# Altium PCB PCB1.pcbdoc (part 1 of 3)
Units mil, origin at the board's own origin, x right, y up, seen from the top; angles counter-clockwise.
Board outline 3937.01 x 3937.01 mil, 6 copper layers (Top Layer, Inner1, Inner2, Inner3, Inner4, Bottom Layer), stack 60.565 mil thick; 226 components, 112 nets, 767 pads, 893 vias.
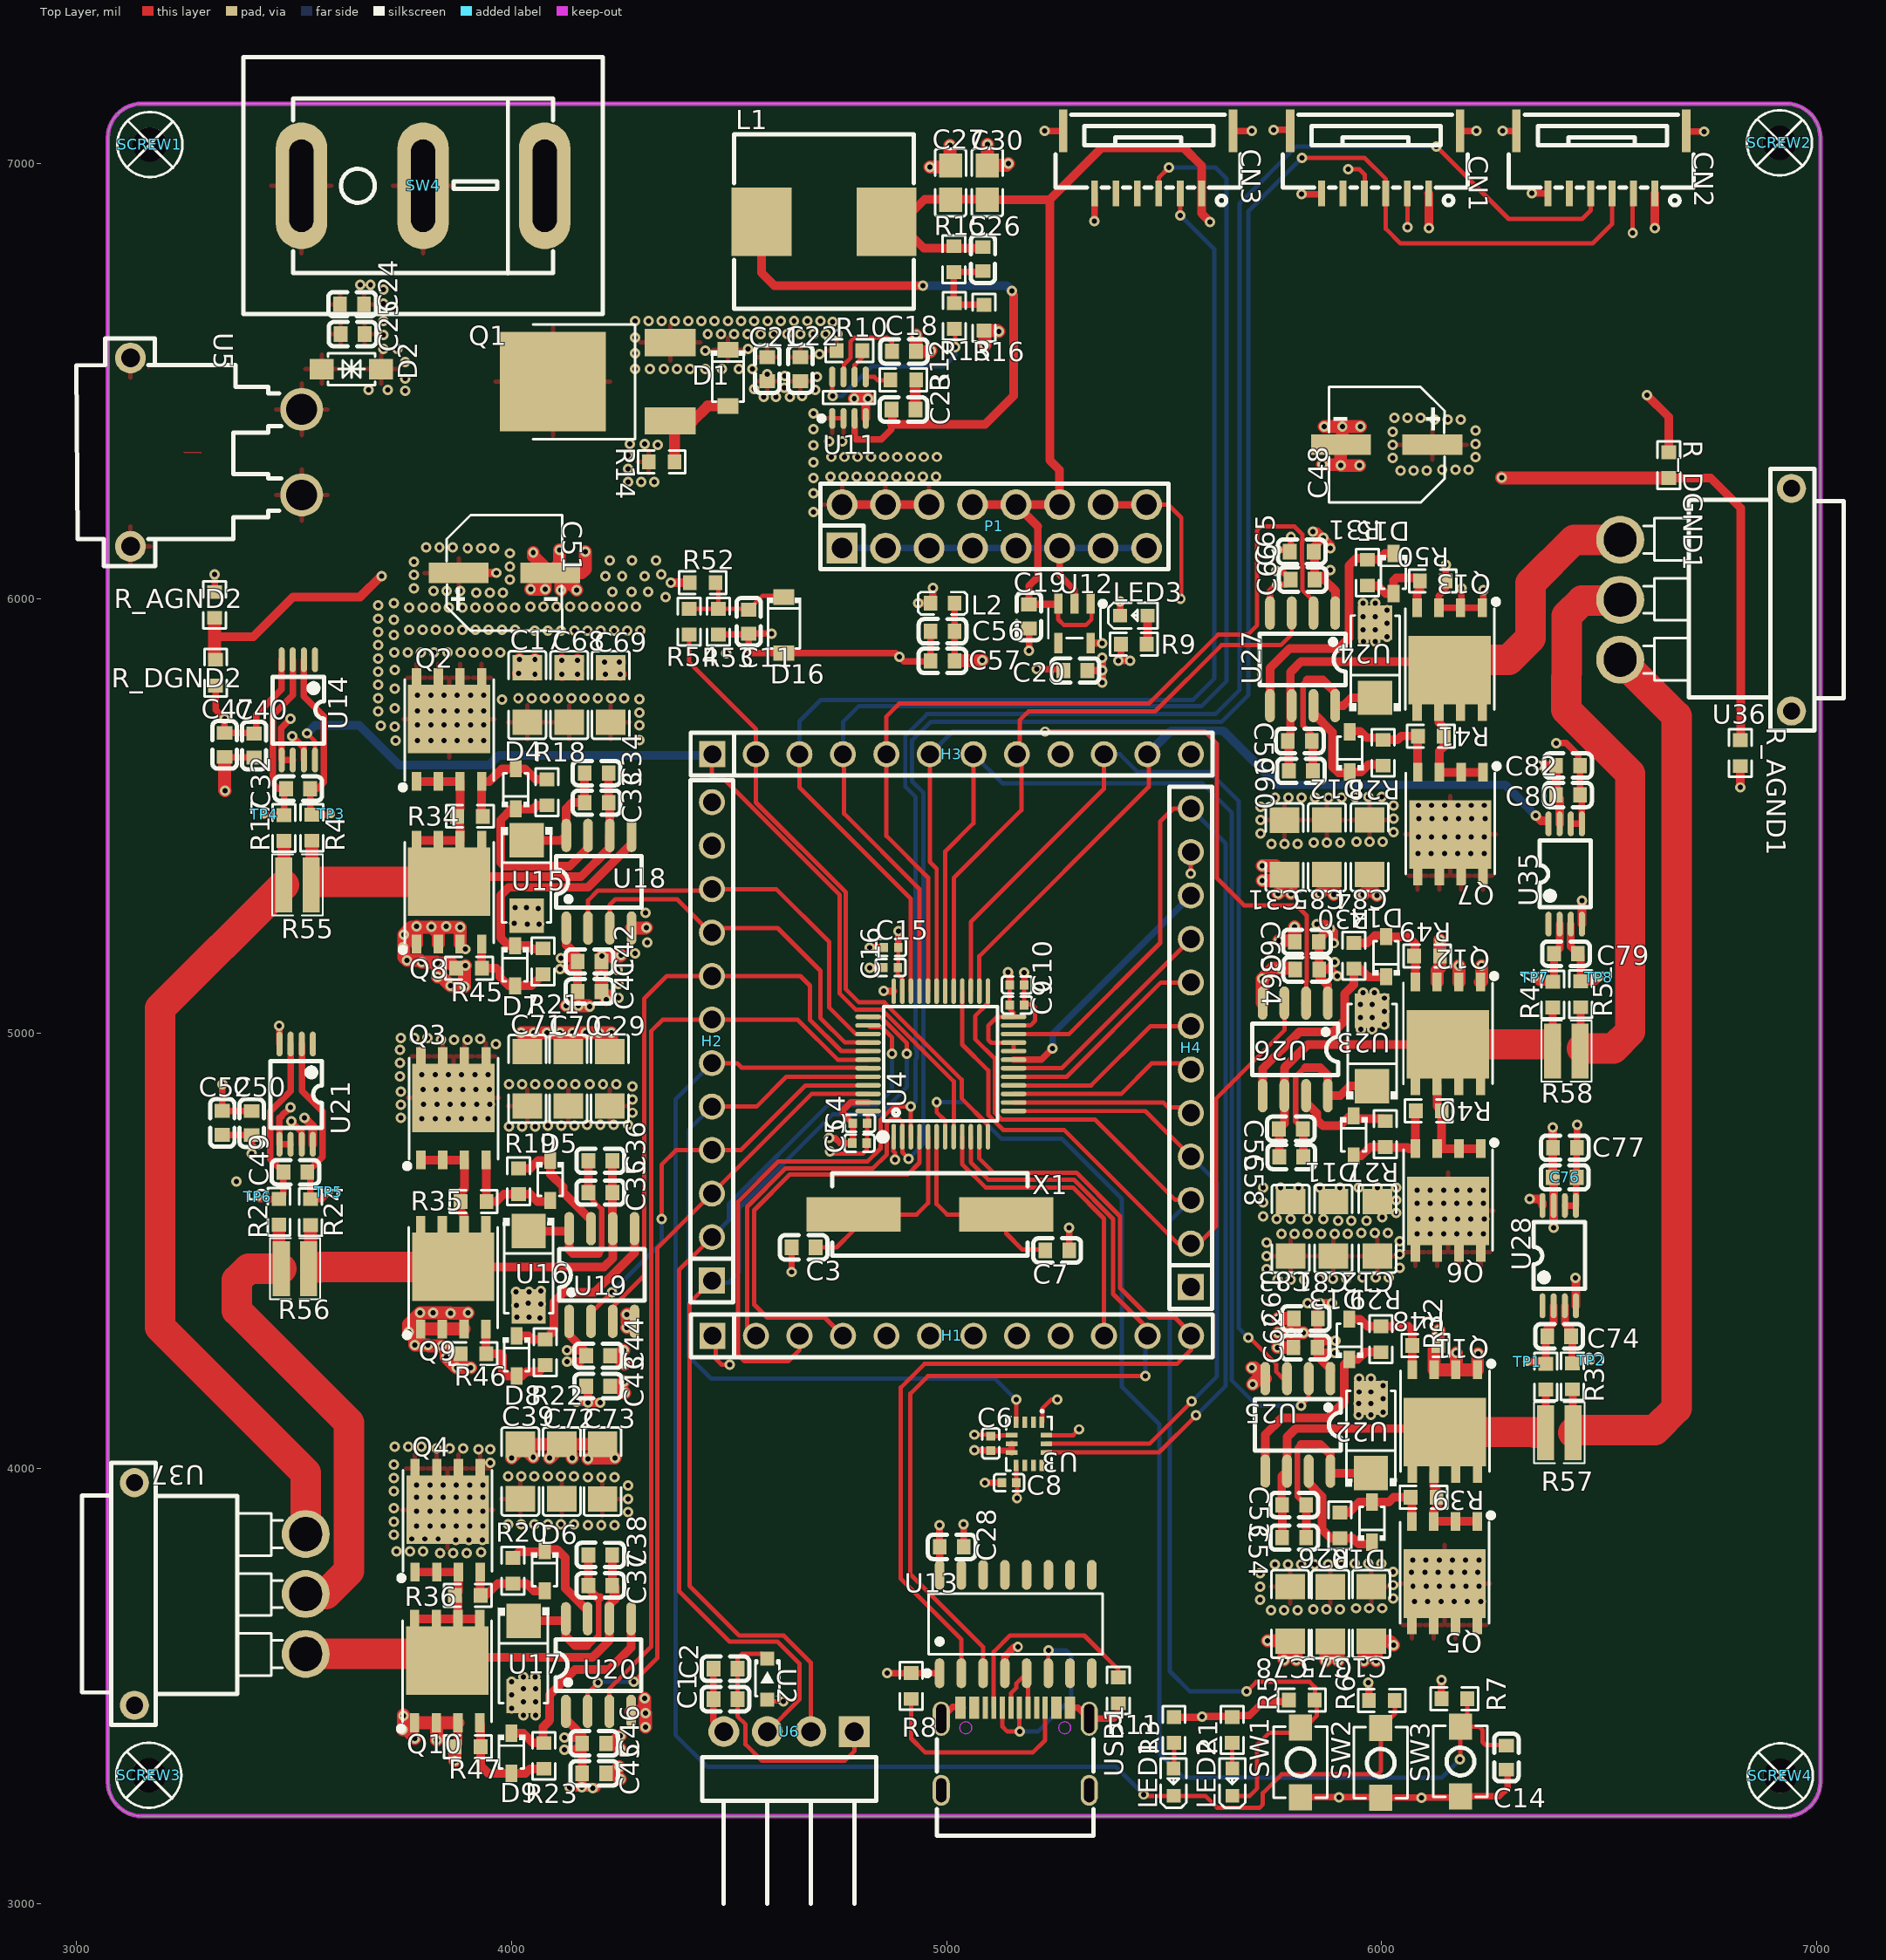
[diagram p0: Top Layer view]
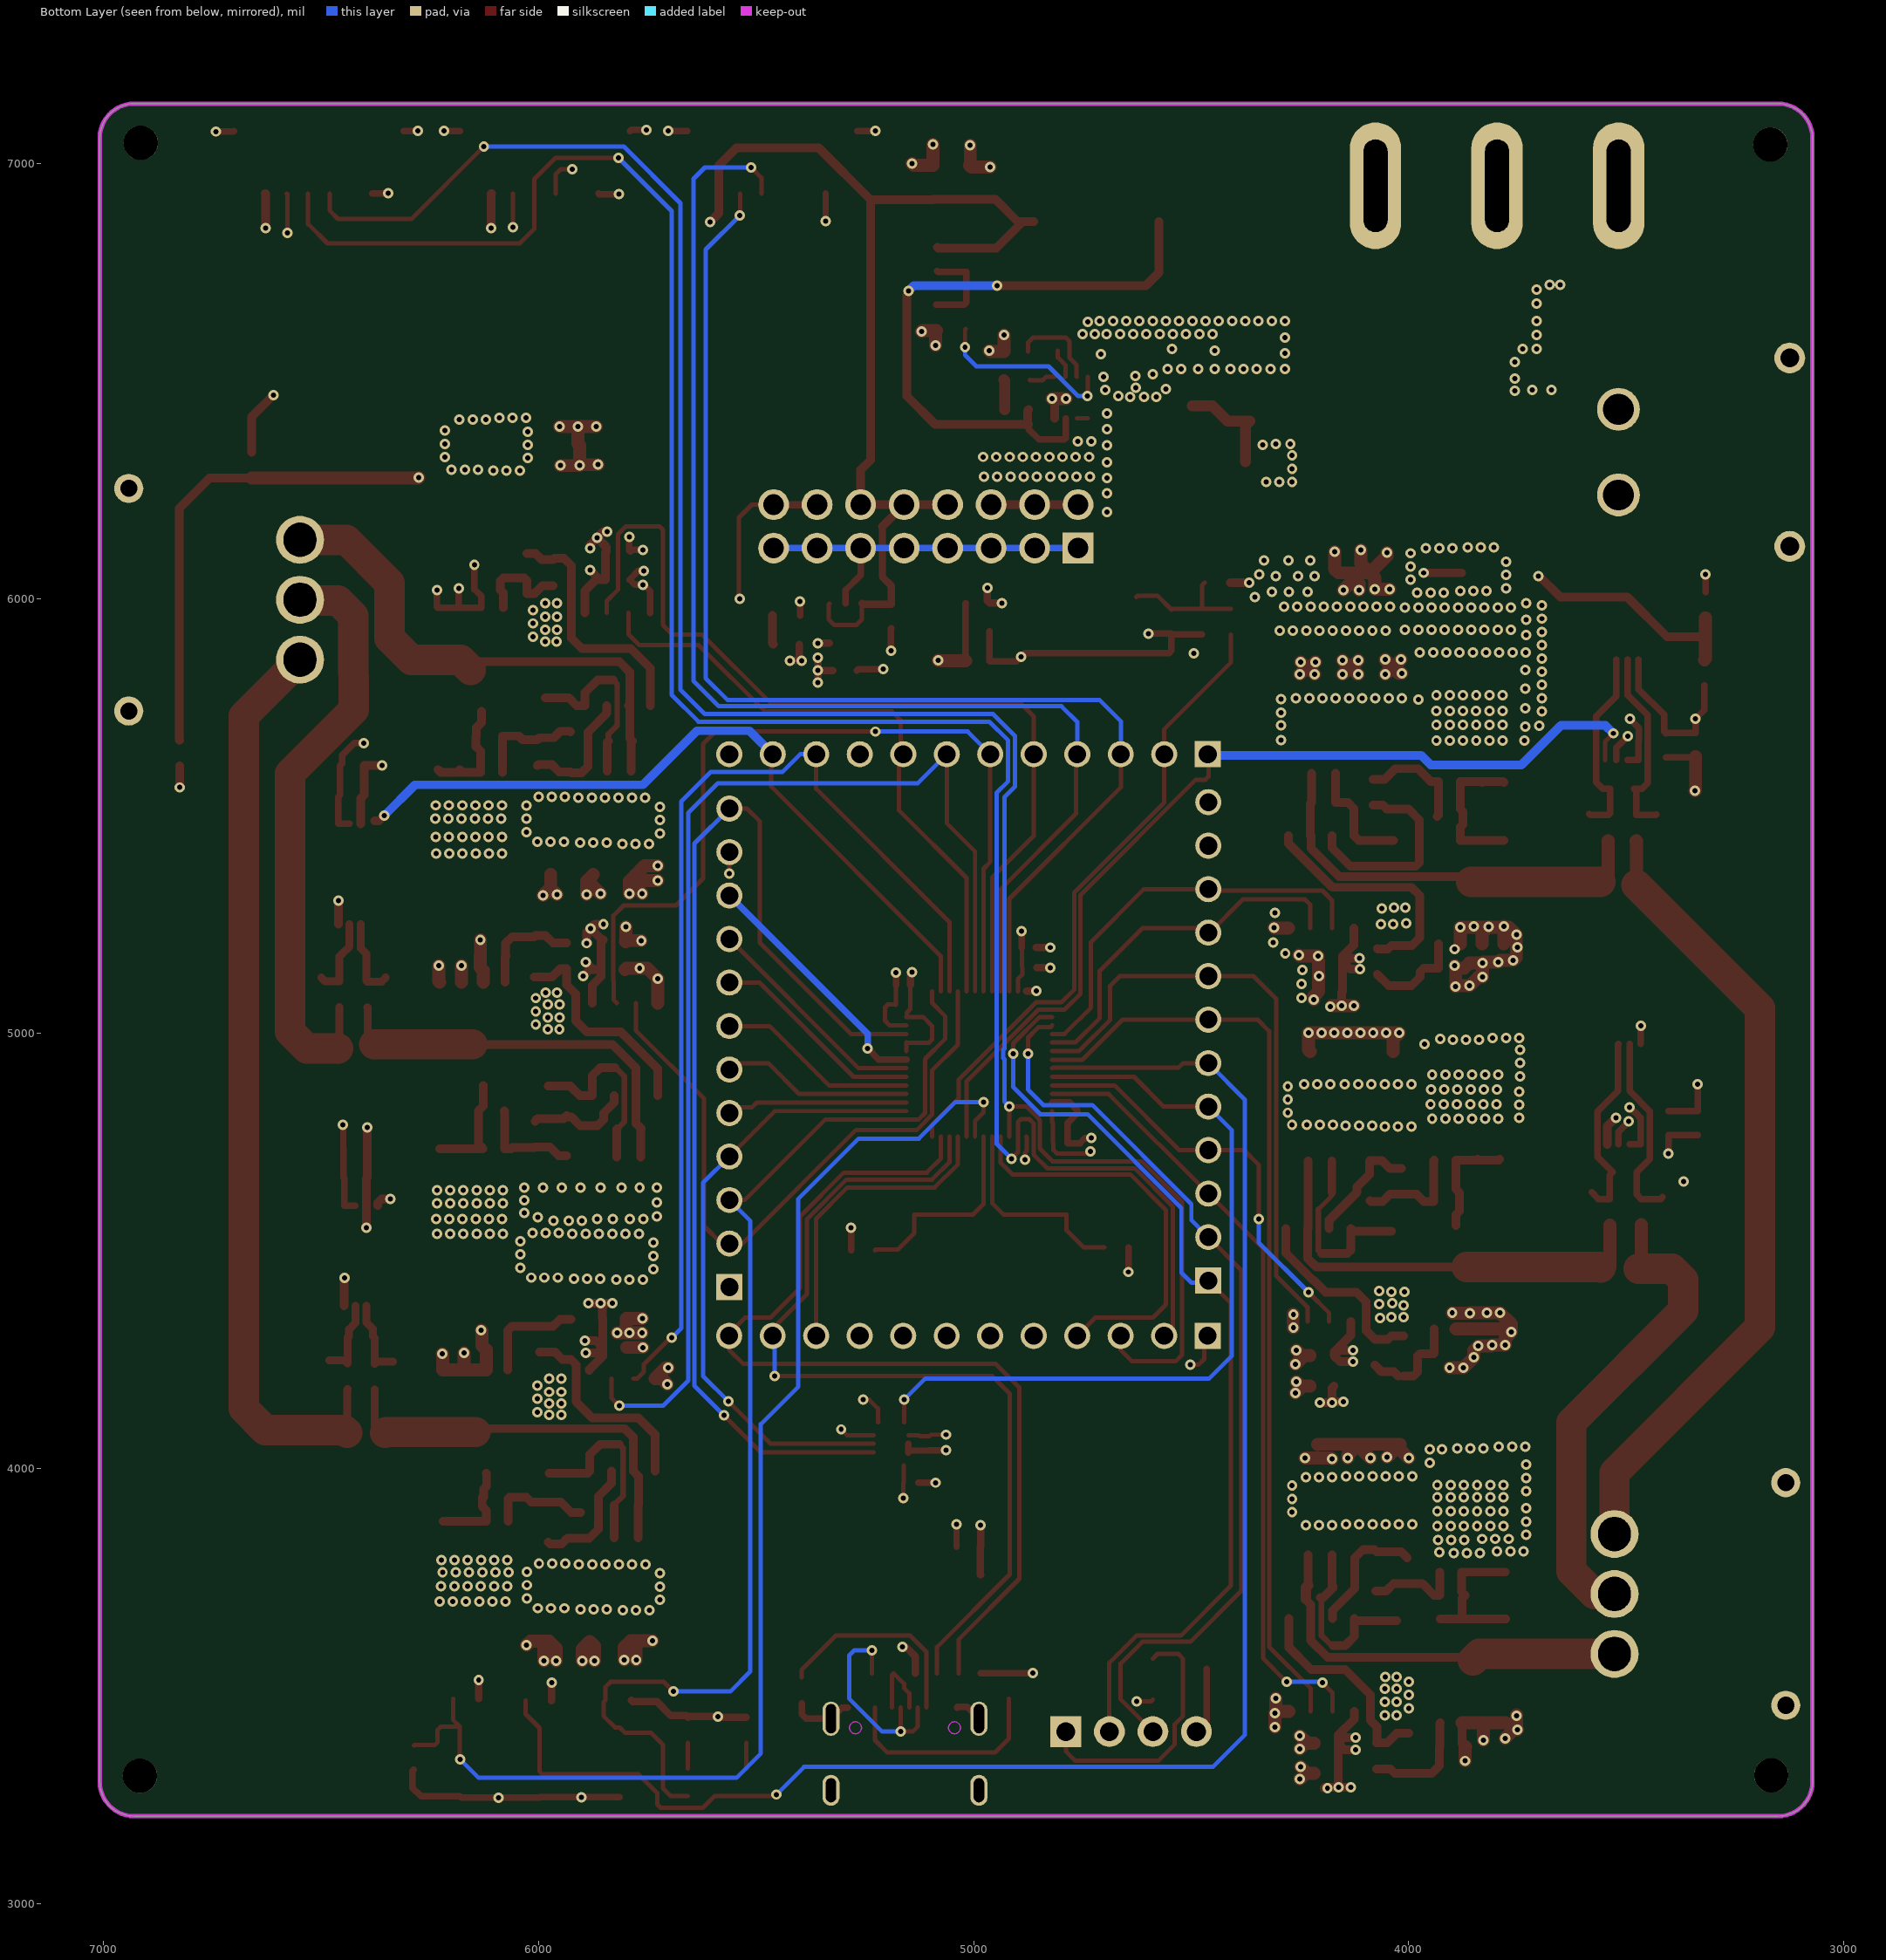
[diagram p1: Bottom Layer view, seen from below]
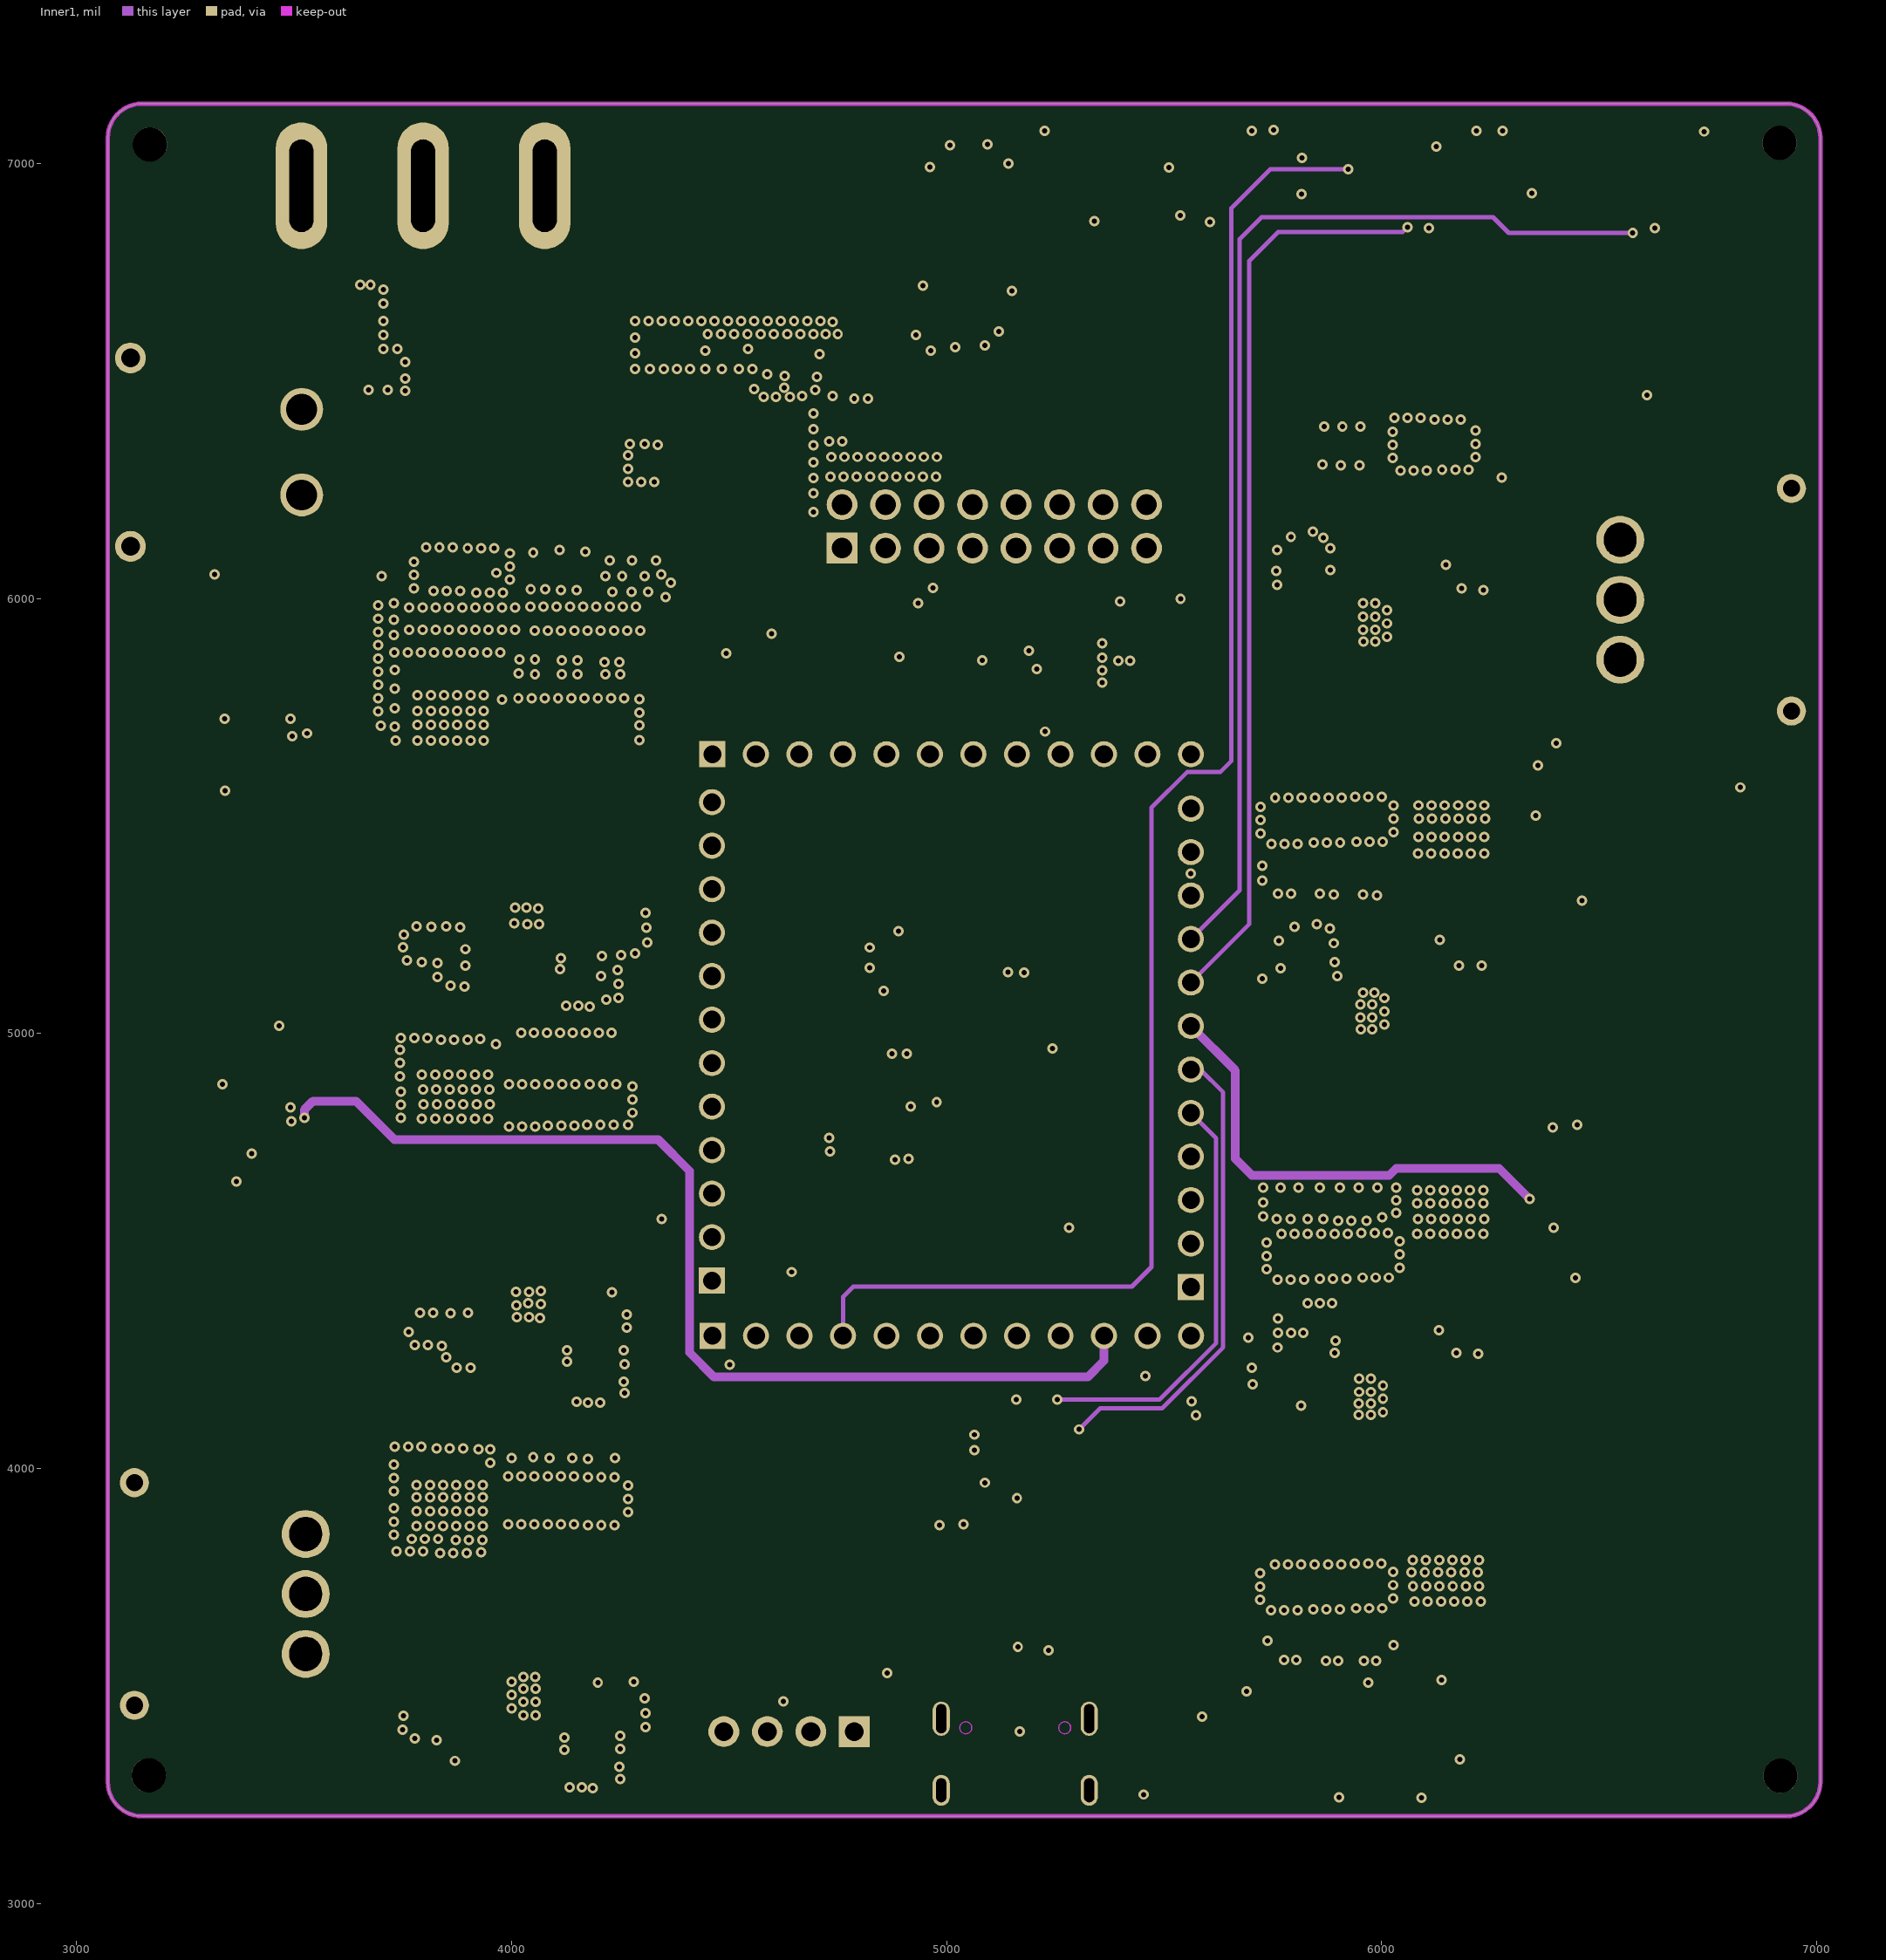
[diagram p2: Inner1]
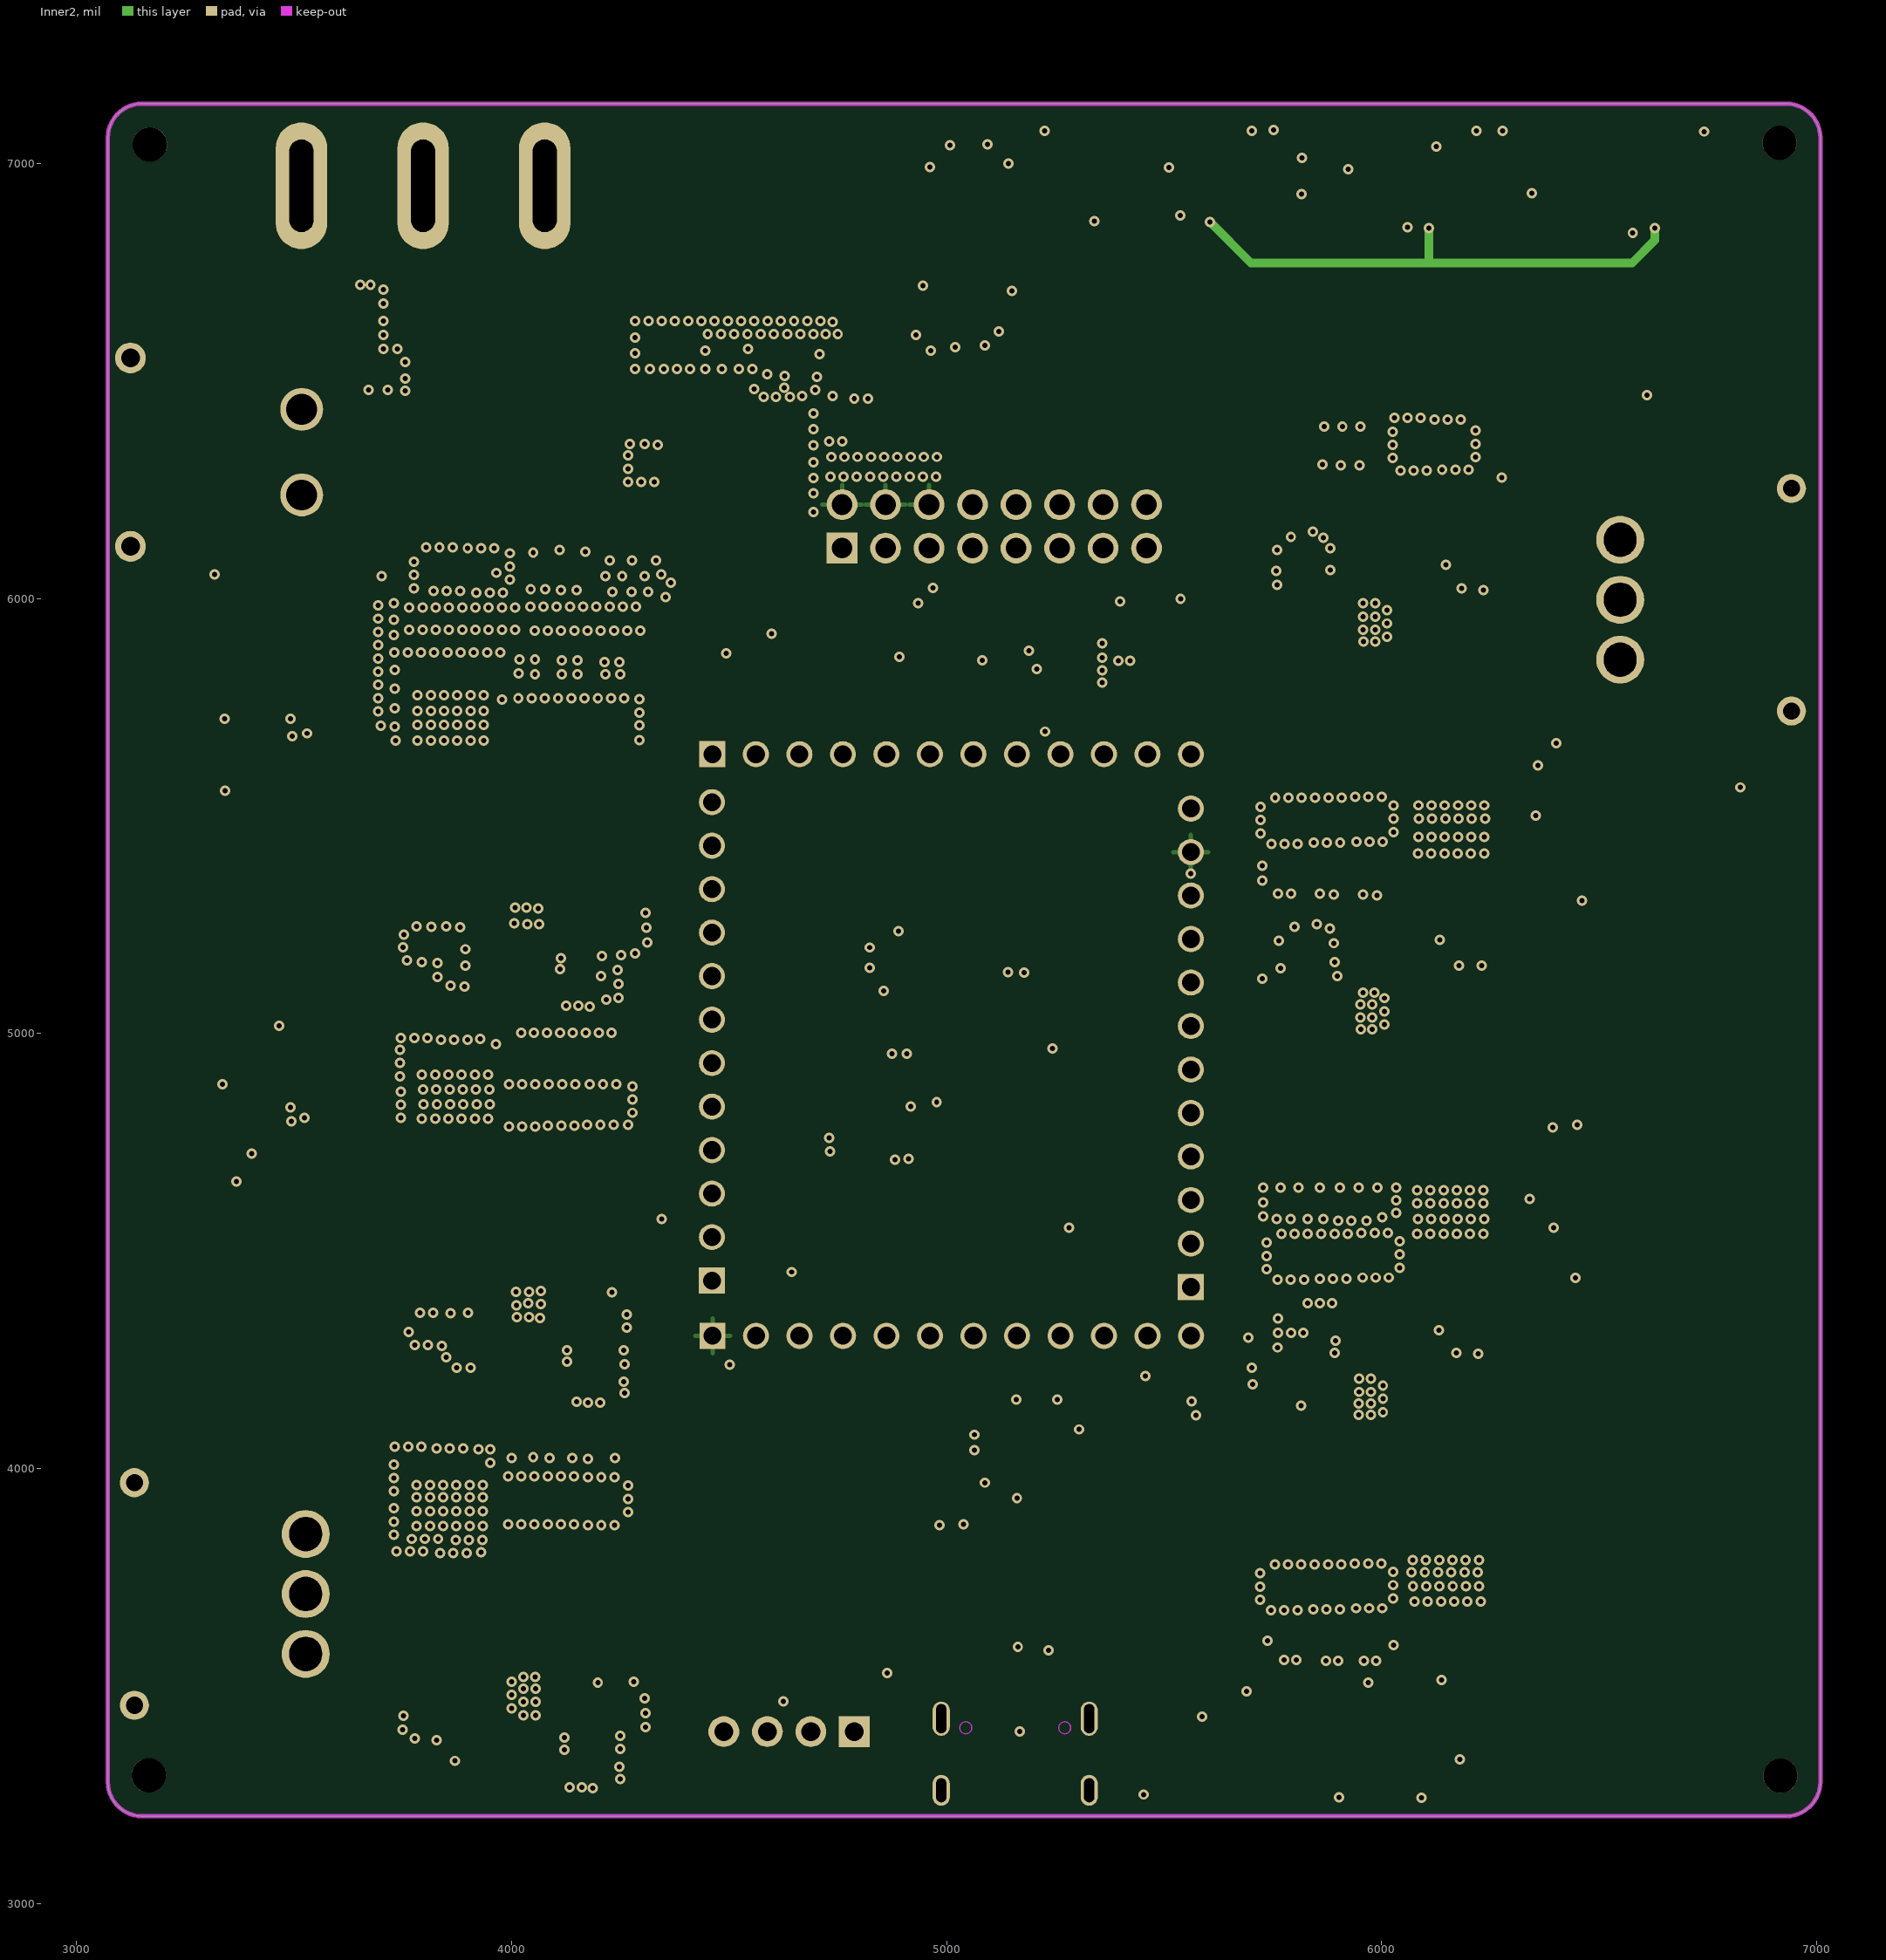
[diagram p3: Inner2]
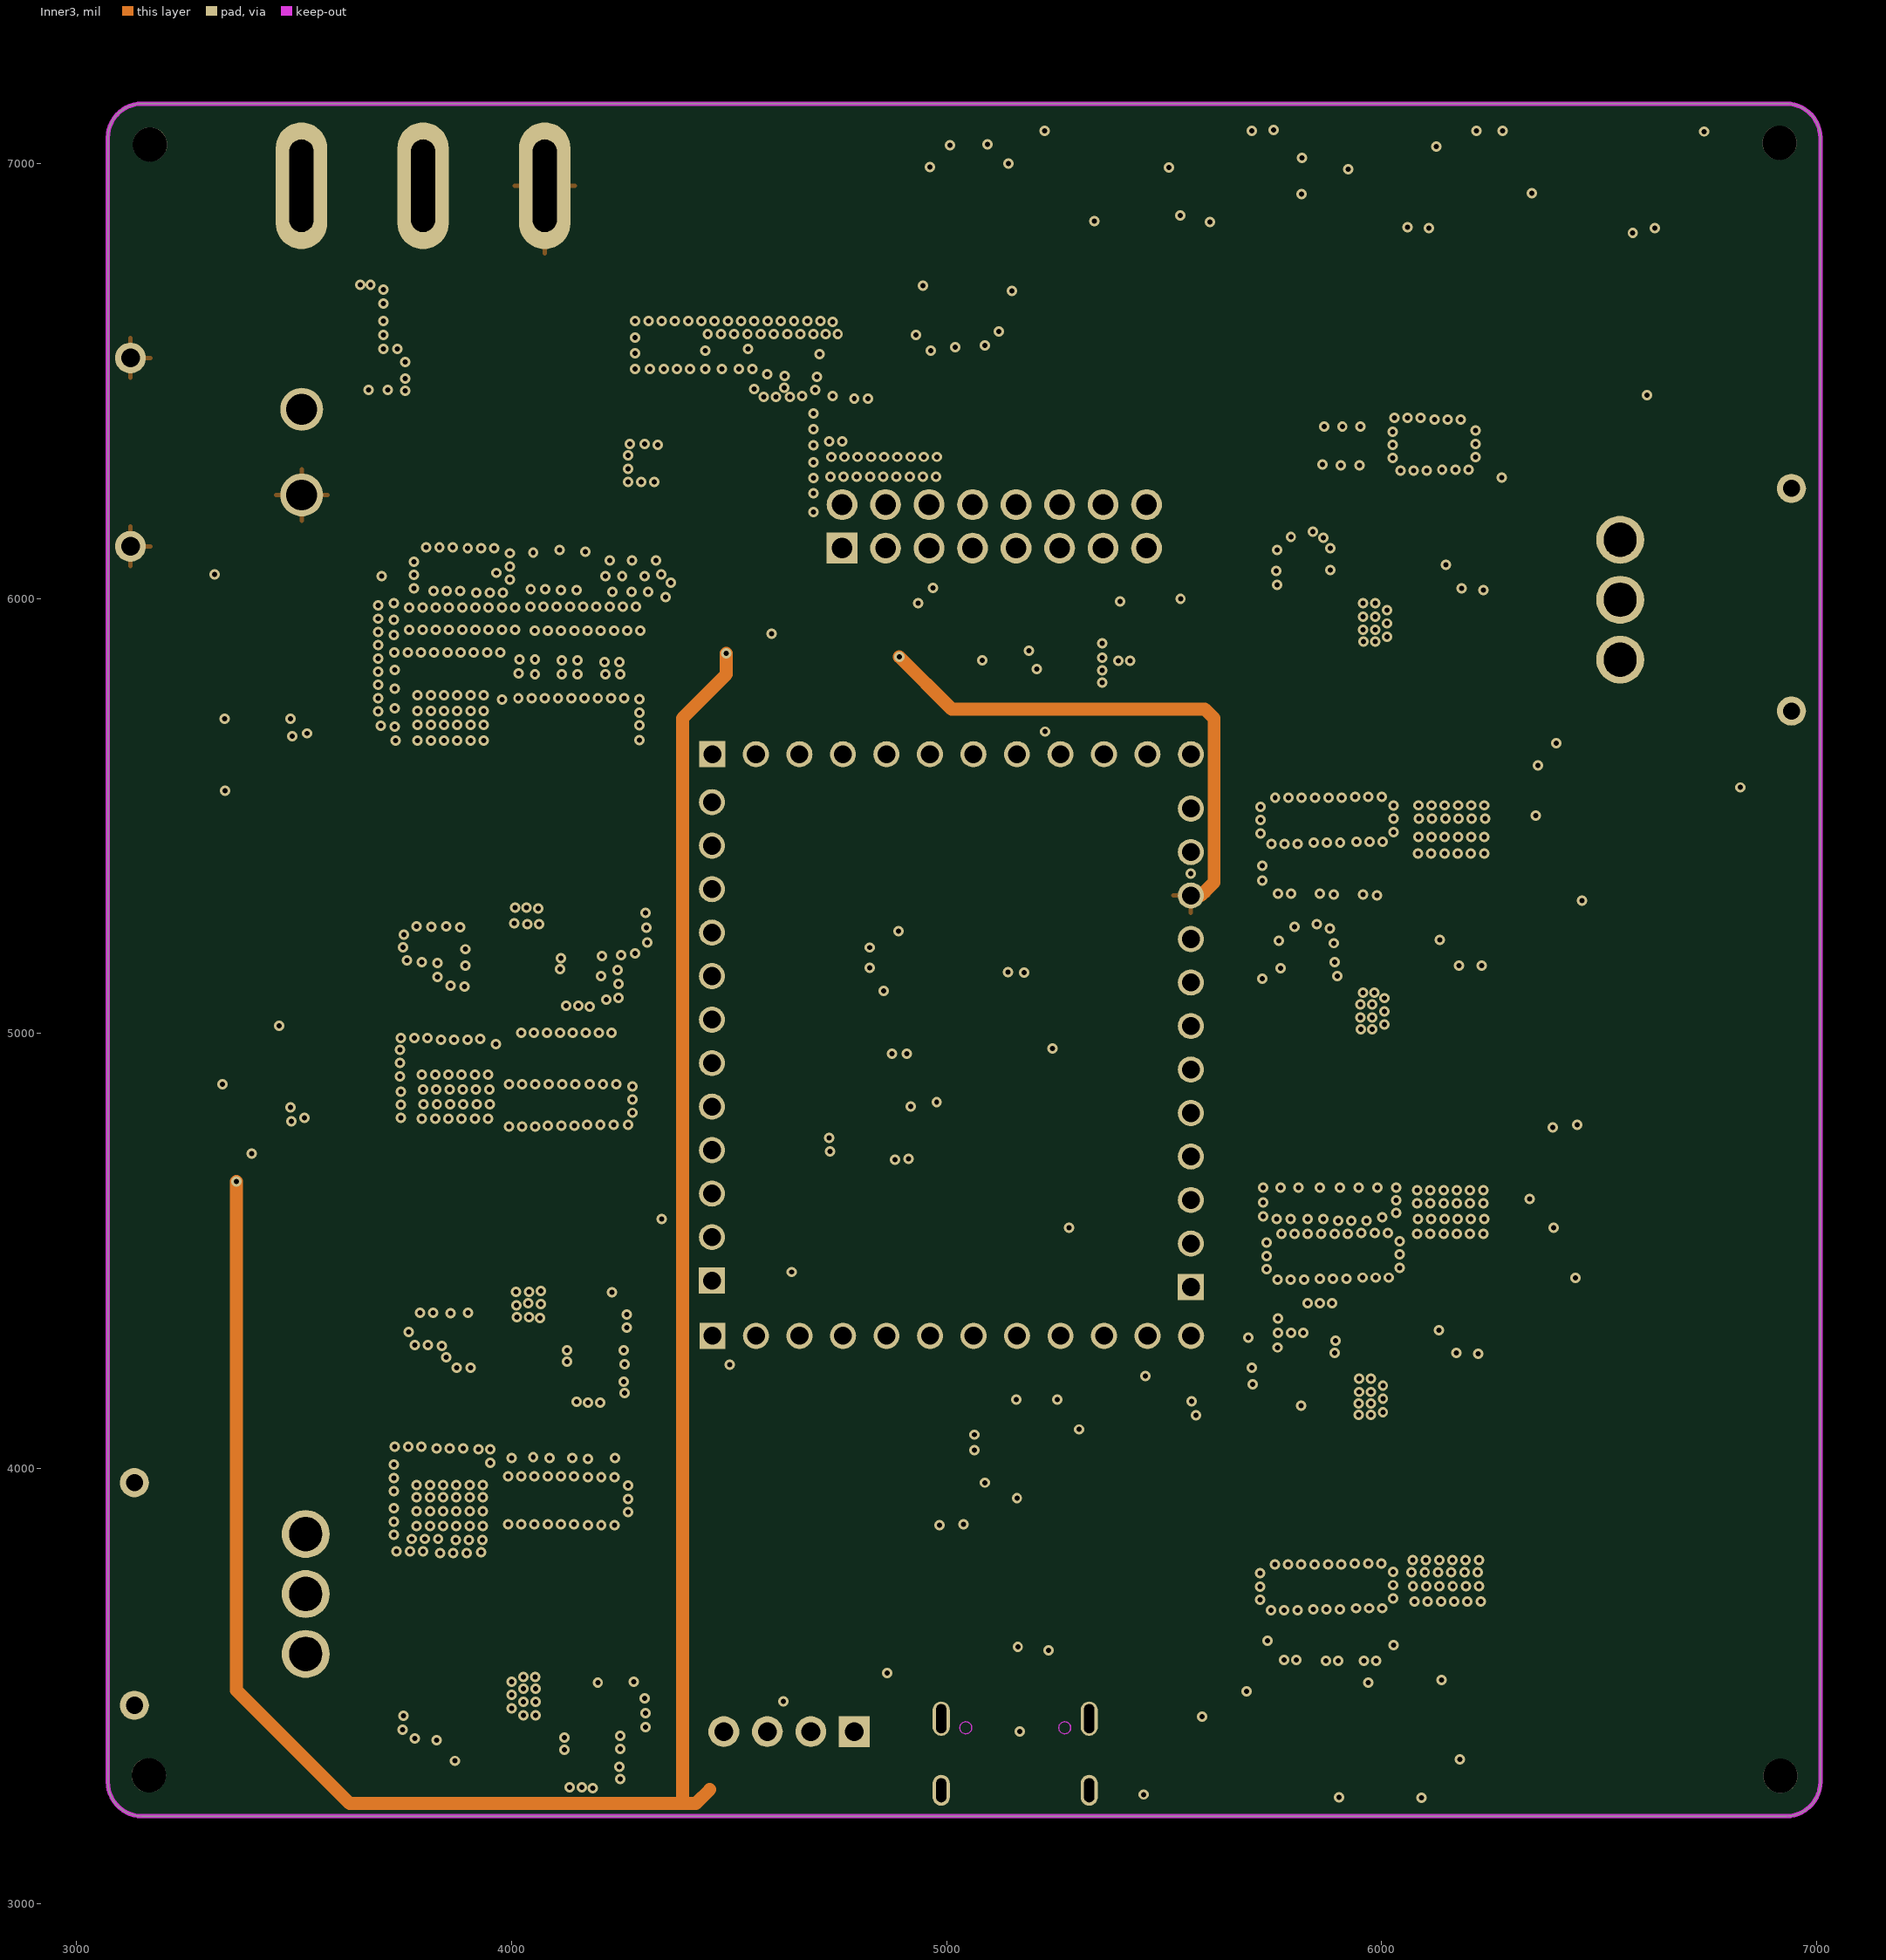
[diagram p4: Inner3]
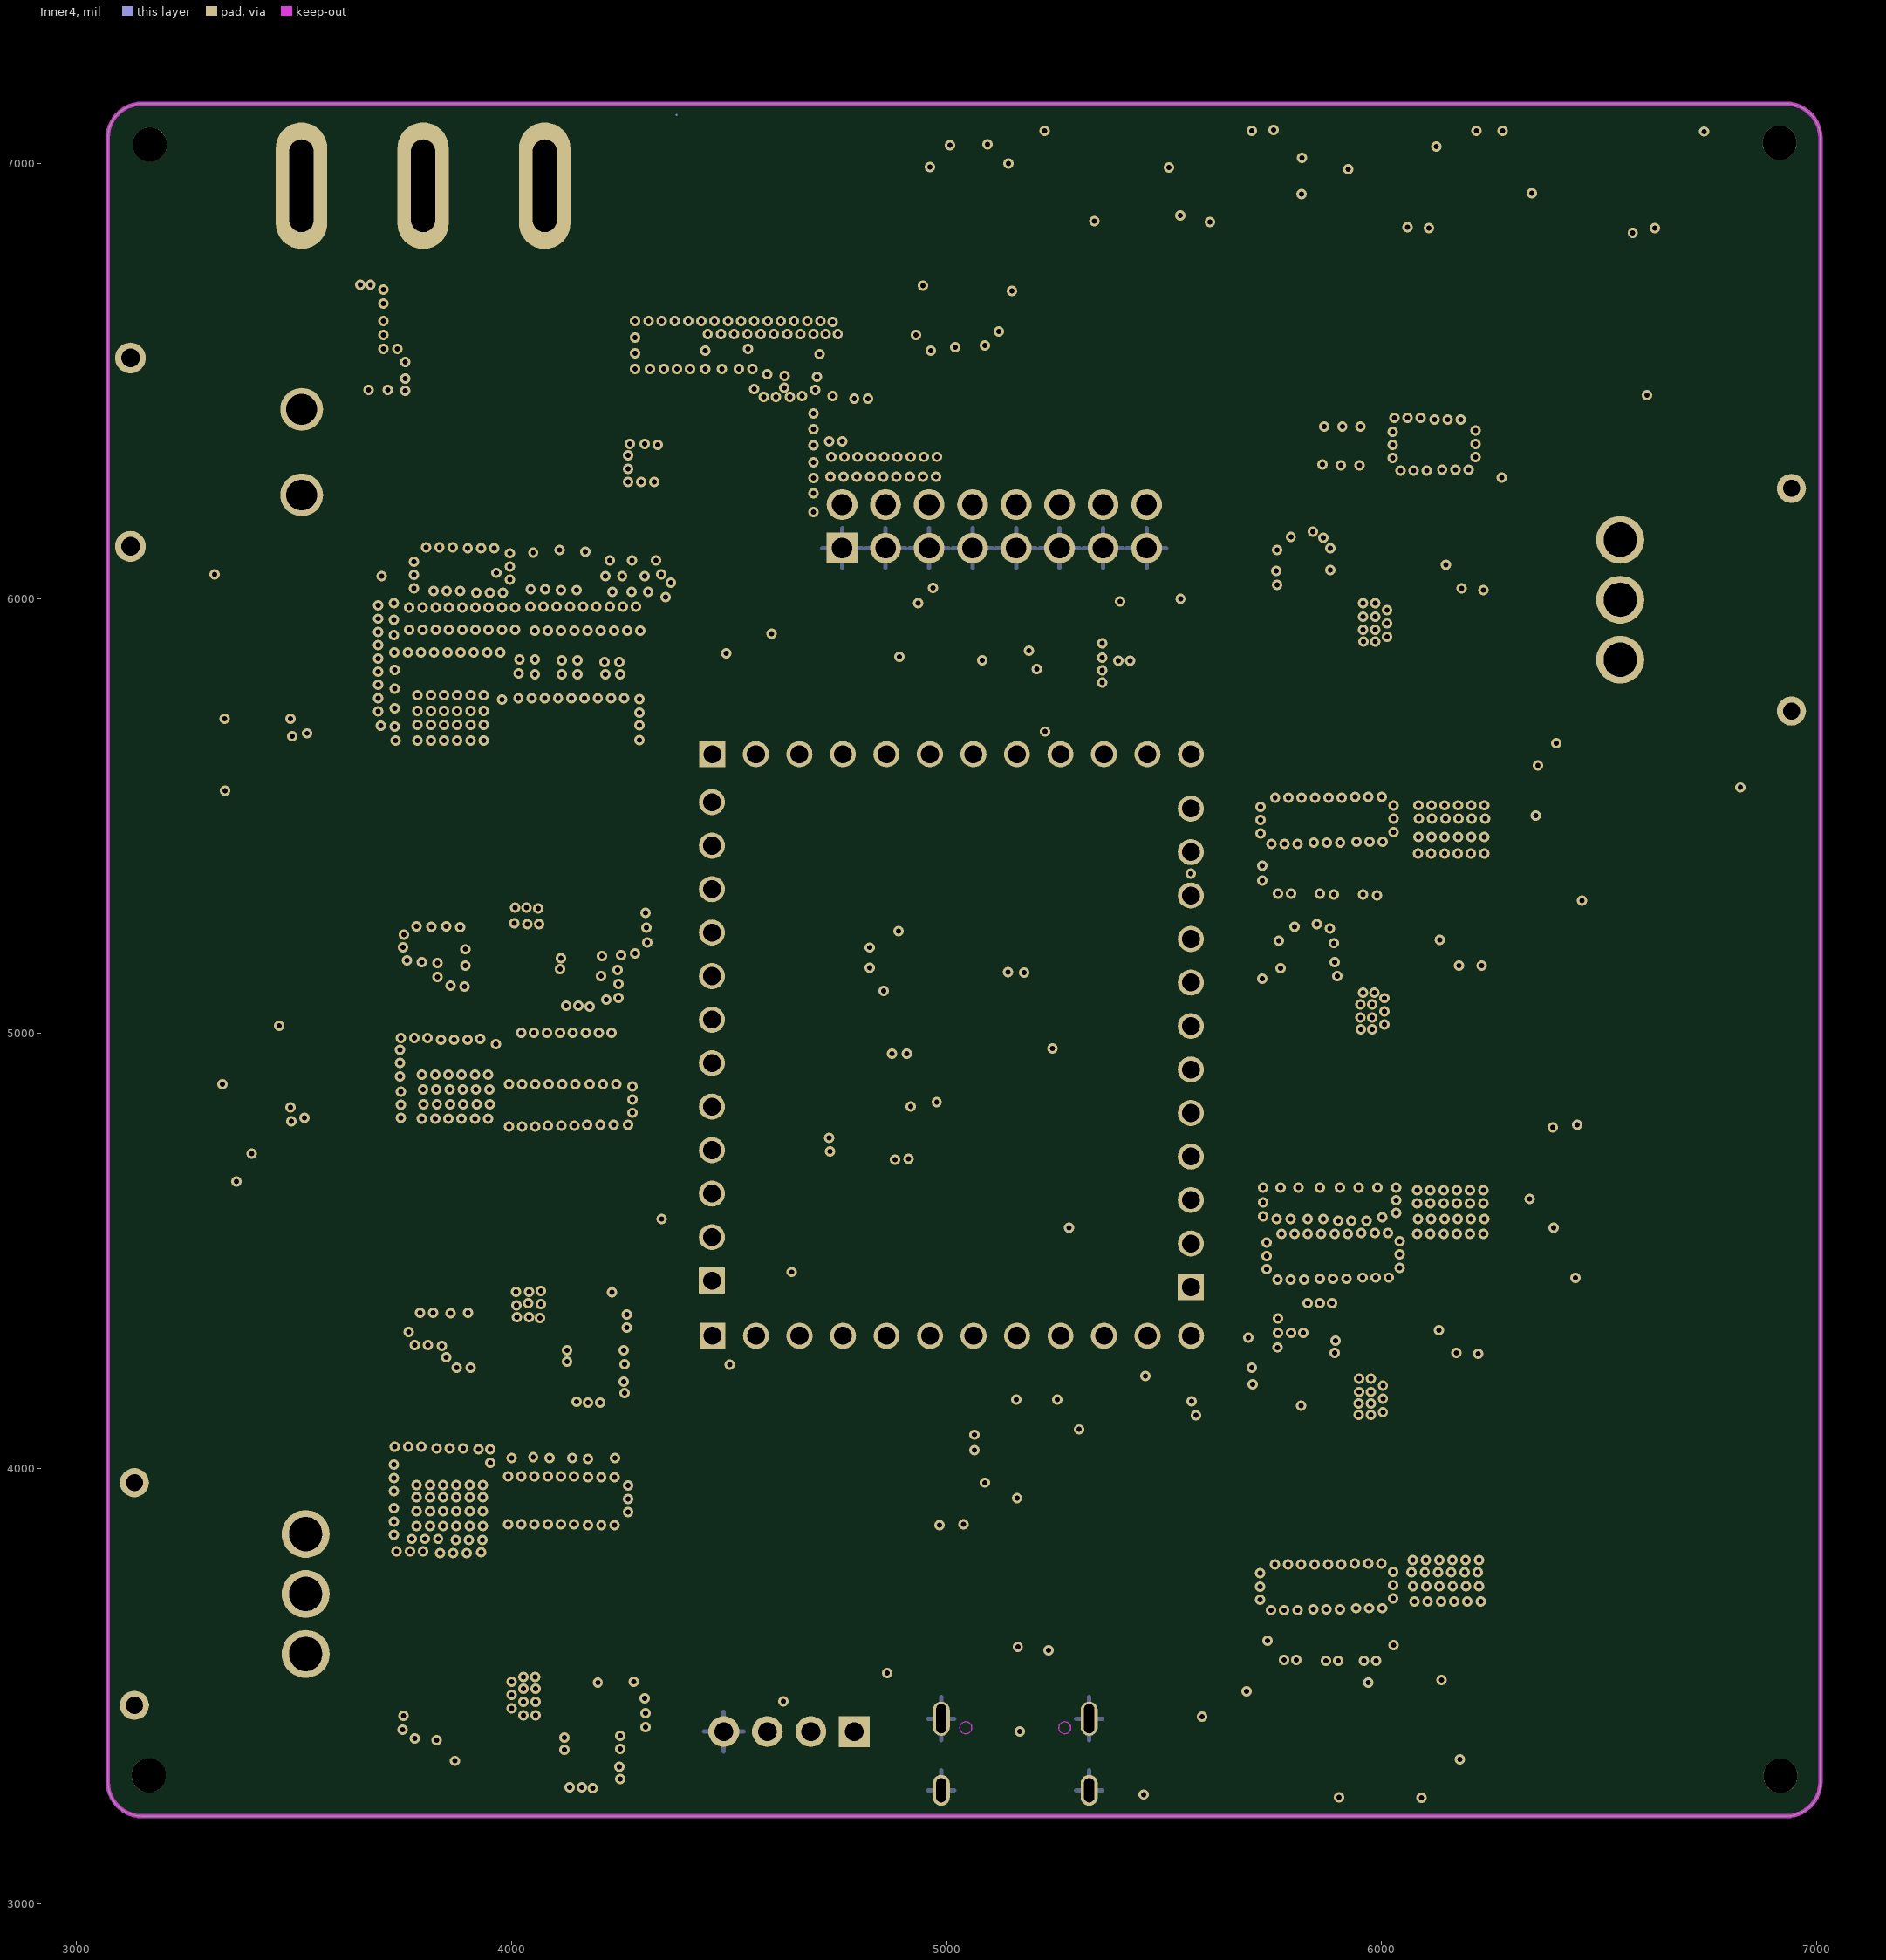
[diagram p5: Inner4]

## Layer stack, top to bottom
Top Layer: signal copper 1.378
Dielectric1: surface 3.913, 3313 RC57% 4.2mil, Dk 0
Inner1: signal copper 0.598
Dielectric2: surface 21.654, 0.55mm H/H No copper, Dk 0
Inner2: signal copper 0.598
Dielectric3: surface 4.283, 2116 RC54% 4.9mil, Dk 0
Inner3: signal copper 0.598
Dielectric4: surface 21.654, 0.55mm H/H No copper, Dk 0
Inner4: signal copper 0.598
Dielectric5: surface 3.913, 3313 RC57% 4.2mil, Dk 0
Bottom Layer: signal copper 1.378

## Board outline
3150.61,7137.95 6930.14,7137.95 cw(c6930.14,7059.21) 7008.88,7059.21 7008.88,3279.69 cw(c6930.14,3279.69) 6930.14,3200.95 3150.61,3200.95 cw(c3150.61,3279.69) 3071.87,3279.69 3071.87,7059.21 cw(c3150.61,7059.21)

## Design rules (kind name [scope] priority, off if disabled: settings)
BoardOutlineClearance copperThickness1oz [All] p0: genericclearance=10 ignorepadtopadclearanceinfootprint=FALSE except(0: Arc-SplitContinuation Track-SplitContinuation SMDPad-SplitContinuation THPad-SplitContinuation Via-SplitContinuation Fill-SplitContinuation Poly-SplitContinuation Region-SplitContinuation Text-SplitContinuation)
BoardOutlineClearance copperThickness2oz [All] p0: genericclearance=10 ignorepadtopadclearanceinfootprint=FALSE except(0: Arc-SplitContinuation Track-SplitContinuation SMDPad-SplitContinuation THPad-SplitContinuation Via-SplitContinuation Fill-SplitContinuation Poly-SplitContinuation Region-SplitContinuation Text-SplitContinuation)
BoardOutlineClearance otherClearance [All] p0: genericclearance=10 ignorepadtopadclearanceinfootprint=FALSE except(0: Arc-SplitContinuation Track-SplitContinuation SMDPad-SplitContinuation THPad-SplitContinuation Via-SplitContinuation Fill-SplitContinuation Poly-SplitContinuation Region-SplitContinuation Text-SplitContinuation)
Clearance copperThickness1oz [All] p1: gap=7 ignorepadtopadclearanceinfootprint=FALSE
Clearance copperThickness2oz [All] p1: gap=7 ignorepadtopadclearanceinfootprint=FALSE
Clearance otherClearance [All] p1: gap=7 ignorepadtopadclearanceinfootprint=FALSE
DiffPairsRouting differentialPair [All] p1: maxuncoupledlength=10 minlimit=6 maxlimit=Infinity mostfreqgap=6 toplayer_minwidth=5 toplayer_prefwidth=10 toplayer_maxwidth=100 bottomlayer_minwidth=5 bottomlayer_prefwidth=10 bottomlayer_maxwidth=100 midlayer1_minwidth=5 midlayer1_prefwidth=10 midlayer1_maxwidth=100 midlayer2_minwidth=5 midlayer2_prefwidth=10 midlayer2_maxwidth=100 midlayer3_minwidth=5 midlayer3_prefwidth=10 midlayer3_maxwidth=100 midlayer4_minwidth=5 midlayer4_prefwidth=10 midlayer4_maxwidth=100
PasteMaskExpansion pasteMaskExpansion [All] p1: expansion=0
PlaneConnect innerPlane [All] p1: planeconnectstyle=Relief reliefexpansion=20 reliefentries=4 reliefconductorwidth=10 reliefairgap=10
PolygonConnect copperRegion [All] p1: connectstyle=Relief reliefentries=4 reliefconductorwidth=10 polygonreliefangle="90 Angle" airgapwidth=10
RoutingVias viaSize [All] p1: viastyle="Through Hole" holewidth=12.0078 minholewidth=11.811 maxholewidth=248.0314 width=12.0078 minwidth=11.811 maxwidth=248.0314
SolderMaskExpansion solderMaskExpansion [All] p1: useseparateexpansions=TRUE expansion=2 expansionbottom=2
Width copperThickness1oz [All] p1: maxlimit=100 minlimit=5 preferedwidth=10
Width copperThickness2oz [All] p1: maxlimit=100 minlimit=8 preferedwidth=10

## Components (designator, comment, footprint, x,y, rotation, side; value= is the part's Value field where it differs from the comment)
C1 "" C0603#1 4491.87,3469.95 r180 top
C2 "" C0603#1 4491.87,3539.95 r180 top
C3 "" ?#1 4671.52,4508.56 r0 top
C4 "" C0603#2 4800.94,4794.2 r0 top
C5 "" C0603#2 4799.94,4748.2 r0 top
C6 "" C0603#2 5101.83,4057.87 r90 top
C7 "" ?#1 5254.43,4501.61 r180 top
C8 "" C0603#2 5143.81,3967.63 r0 top
C9 "" C0603#2 5162.07,5065.83 r180 top
C10 "" C0603#2 5162.06,5112.01 r180 top
C11 "" C0603#1 4545.22,5947.11 r270 top
C12 "" C1206 5990.3,4551.08 r270 top
C13 "" C1206 5976.31,3665.9 r90 top
C14 "" ?#1 6287.12,3335.68 r90 top
C15 "" C0603#2 4872.58,5198.26 r180 top
C16 "" C0603#2 4871.44,5152.09 r180 top
C17 "" C1206 4036.19,5778.34 r270 top
C18 "" C0603#1 4902.15,6568.47 r180 top
C19 "" C0603#1 5189.4,5959.1 r270 top
C20 "" C0603#1 5296.13,5834.77 r180 top
C21 "" C0603#1 4587.82,6527.56 r90 top
C22 "" C0603#1 4664.12,6527.56 r90 top
C23 "" C0603#1 4901.02,6434.71 r0 top
C24 "" C0603#1 3633.48,6676.88 r180 top
C25 "" C0603#1 3634.64,6608.11 r180 top
C26 "" C0603#1 5083.76,6780.55 r270 top
C27 "" C0805#1 5009.18,6956.6 r90 top
C28 "" C0805#2 5011.87,3819.95 r0 top
C29 "" C1206 4226.15,4896 r270 top
C30 "" C0805#1 5093.8,6956.6 r90 top
C31 "" C1206 5777.02,5428.09 r90 top
C32 "" C0603#1 3509.51,5563.23 r0 top
C33 "" C0603#1 4195.49,5530.88 r180 top
C34 "" C0603#1 4195.49,5598.87 r180 top
C35 "" C0603#1 4204.16,4634.53 r180 top
C36 "" C0603#1 4204.16,4707.62 r180 top
C37 "" C0603#1 4204.07,3731.35 r180 top
C38 "" C0603#1 4204.07,3801.35 r180 top
C39 "" C1206 4019.91,3993.21 r270 top
C40 "" C0603#1 3408.23,5662.24 r90 top
C41 "" C0603#1 4179.43,5096.94 r180 top
C42 "" C0603#1 4179.43,5165.92 r180 top
C43 "" C0603#1 4199.16,4189.53 r180 top
C44 "" C0603#1 4199.16,4259.53 r180 top
C45 "" C0603#1 4190.02,3299.34 r180 top
C46 "" C0603#1 4190.02,3368.36 r180 top
C47 "" C0603#1 3340.4,5663.85 r90 top
C48 "" CAP-SMD_BD6.3-L6.6-W6.6-FD 6011.88,6353.63 r180 top
C49 "" C0603#1 3503.21,4681.3 r0 top
C50 "" C0603#1 3402.66,4794.3 r270 top
C51 "" CAP-SMD_BD6.3-L6.6-W6.6-FD 3983.73,6059.24 r0 top
C52 "" C0603#1 3335.08,4794.83 r270 top
C53 "" C0603#1 5799.2,3916.27 r0 top
C54 "" C0603#1 5799.2,3841.27 r0 top
C55 "" C0603#1 5791.55,4781.1 r0 top
C56 "" C0603#1 4990.92,5925.05 r180 top
C57 "" C0603#1 4990.76,5857.03 r180 top
C58 "" C0603#1 5792.54,4716.46 r0 top
C59 "" C0603#1 5812.08,5672.75 r0 top
C60 "" C0603#1 5814.63,5603.94 r0 top
C61 "" C0603#1 5826.04,4345.15 r0 top
C62 "" C0603#1 5825.4,4278.46 r0 top
C63 "" C0603#1 5828.29,5211.03 r0 top
C64 "" C0603#1 5828.92,5147.31 r0 top
C65 "" C0603#1 5816.64,6107.91 r0 top
C66 "" C0603#1 5818.65,6043.66 r0 top
C68 "" C1206 4132.75,5778.34 r270 top
C69 "" C1206 4228.05,5778.34 r270 top
C70 "" C1206 4130.82,4896 r270 top
C71 "" C1206 4036.09,4896 r270 top
C72 "" C1206 4115.37,3993.21 r270 top
C73 "" C1206 4209.24,3993.08 r270 top
C74 "" C0603#1 6408.4,4304.01 r180 top
C75 "" C1206 5882.56,3665.33 r90 top
C76 "" C0603#1 6421.13,4669.56 r180 top
C77 "" C0603#1 6421.66,4737.73 r180 top
C78 "" C1206 5789.86,3665.64 r90 top
C79 "" C0603#1 6424.04,5183.72 r180 top
C80 "" C0603#1 6428.8,5548.62 r180 top
C81 "" C1206 5889,4551.08 r270 top
C82 "" C0603#1 6428.77,5616.26 r180 top
C83 "" C1206 5790.89,4551.08 r270 top
C84 "" C1206 5972.44,5428.64 r90 top
C85 "" C1206 5874.43,5428.64 r90 top
CN1 "" CONN-SMD_GH1.25-6P 5985.3,7003.43 r180 top
CN2 "" CONN-SMD_GH1.25-6P 6505.34,7003.43 r180 top
CN3 "" CONN-SMD_GH1.25-6P 5463.25,7003.43 r180 top
D1 "" SOD-123_L2.7-W1.6-LS3.7-RD 4497.46,6507.48 r270 top
D2 "" SOD-123_L2.7-W1.8-LS3.7-BI 3632.07,6527.56 r180 top
D4 "" SOD-323_L1.8-W1.3-LS2.5-RD 4009.7,5562.89 r90 top
D5 "" SOD-323_L1.8-W1.3-LS2.5-RD 4088.74,4662.31 r270 top
D6 "" SOD-323_L1.8-W1.3-LS2.5-RD 4076.28,3765.08 r270 top
D7 "" SOD-323_L1.8-W1.3-LS2.5-RD 4008.08,5156.1 r270 top
D8 "" SOD-323_L1.8-W1.3-LS2.5-RD 4011.66,4259.01 r270 top
D9 "" SOD-323_L1.8-W1.3-LS2.5-RD 3999.98,3345.44 r270 top
D10 "" SOD-323_L1.8-W1.3-LS2.5-RD 5978,3876.93 r90 top
D11 "" SOD-323_L1.8-W1.3-LS2.5-RD 5936.11,4765.04 r270 top
D12 "" SOD-323_L1.8-W1.3-LS2.5-RD 5926.97,5647.74 r90 top
D13 "" SOD-323_L1.8-W1.3-LS2.5-RD 5926.07,4297.2 r90 top
D14 "" SOD-323_L1.8-W1.3-LS2.5-RD 6010.4,5176.65 r90 top
D15 "" SOD-323_L1.8-W1.3-LS2.5-RD 6027.46,6057.72 r270 top
D16 "" SOD-123_L2.7-W1.6-LS3.7-RD 4626.29,5939.24 r270 top
H1 "" HDR-TH_12P-P2.54-V-M 5012.05,4305.18 r0 top
H2 "" HDR-TH_12P-P2.54-V-M 4460.66,4982.17 r90 top
H3 "" HDR-TH_12P-P2.54-V-M 5011.84,5642.33 r0 top
H4 "" HDR-TH_12P-P2.54-V-M 5561.64,4967.44 r90 top
L1 "" IND-SMD_L10.5-W10.2-HSB-1050 4718.33,6866.89 r180 top
L2 "" L0603 4990.76,5989.55 r0 top
LED1 "" LED_0603 5521.84,3281.09 r90 top
LED2 "" LED_0603 5656.84,3281.09 r90 top
LED3 "" LED_0603 5432.67,5961.26 r0 top
P1 "" HDR-TH_16P-P2.54-V-M-R2-C8-S2.54 5109.87,6166.14 r0 top
Q1 "" TO-252-2_L6.6-W6.1-P4.57-LS9.9-BR-CW 4229.98,6498.76 r0 top
Q2 "" DFN5X6-8_L5.8-W5.0-P1.27-LS6.2-BL-EP 3856.51,5699.02 r0 top
Q3 "" DFN5X6-8_L5.8-W5.0-P1.27-LS6.2-BL-EP 3866.52,4828.39 r0 top
Q4 "" DFN5X6-8_L5.8-W5.0-P1.27-LS6.2-BL-EP 3853.12,3881.21 r0 top
Q5 "" DFN5X6-8_L5.8-W5.0-P1.27-LS6.2-BL-EP 6145.05,3759.52 r180 top
Q6 "" DFN5X6-8_L5.8-W5.0-P1.27-LS6.2-BL-EP 6152.92,4616.45 r180 top
Q7 "" DFN5X6-8_L5.8-W5.0-P1.27-LS6.2-BL-EP 6158.24,5481.91 r180 top
Q8 "" DFN5X6-8_L5.8-W5.0-P1.27-LS6.2-BL-EP 3856.51,5325.23 r0 top
Q9 "" DFN5X6-8_L5.8-W5.0-P1.27-LS6.2-BL-EP 3866.01,4439.8 r0 top
Q10 "" DFN5X6-8_L5.8-W5.0-P1.27-LS6.2-BL-EP 3852.19,3534.85 r0 top
Q11 "" DFN5X6-8_L5.8-W5.0-P1.27-LS6.2-BL-EP 6145.72,4108.06 r180 top
Q12 "" DFN5X6-8_L5.8-W5.0-P1.27-LS6.2-BL-EP 6152.61,4999.33 r180 top
Q13 "" DFN5X6-8_L5.8-W5.0-P1.27-LS6.2-BL-EP 6156.71,5859.89 r180 top
R1 "" ?#2 5656.84,3398.95 r90 top
R3 "" ?#2 5522.85,3398.95 r90 top
R4 "" R0603 3540.98,5473.29 r270 top
R5 "" ?#2 5816.7,3467.51 r180 top
R6 "" ?#2 6000.53,3466.68 r180 top
R7 "" ?#2 6167.33,3471.15 r180 top
R8 "" R0603 4918.7,3500.13 r270 top
R9 "" ?#2 5430.66,5895 r180 top
R10 "" R0603 4776.8,6569.76 r180 top
R11 "" R0603 5395.33,3489.96 r270 top
R12 "" R0603 4900.63,6503.09 r180 top
R13 "" R0603 5017.86,6650.04 r270 top
R14 "" R0603 4345.15,6314.72 r0 top
R15 "" R0603 5016.68,6780.46 r90 top
R16 "" R0603 5085.77,6646.02 r90 top
R17 "" R0603 3476.98,5472.8 r270 top
R18 "" R0603 4081.59,5554.62 r270 top
R19 "" R0603 4016.45,4660.3 r90 top
R20 "" R0603 4003.2,3765.08 r90 top
R21 "" R0603 4072.33,5166.14 r90 top
R22 "" R0603 4077.44,4267.32 r90 top
R23 "" R0603 4074.27,3339.41 r90 top
R24 "" R0603 3537.59,4589.7 r270 top
R25 "" R0603 3465.32,4590.1 r270 top
R26 "" R0603 5903.98,3869.52 r270 top
R27 "" R0603 6008.4,4769.05 r90 top
R28 "" R0603 6003.27,5645.73 r270 top
R29 "" R0603 5998.35,4297.2 r270 top
R30 "" R0603 5936.11,5178.66 r270 top
R31 "" R0603 5967.23,6059.72 r90 top
R32 "" R0603 6377.19,4211.36 r270 top
R33 "" R0603 6439.09,4211.93 r270 top
R34 "" R0603 3904.61,5499.72 r0 top
R35 "" R0603 3912.86,4613.75 r0 top
R36 "" R0603 3899.58,3708.48 r0 top
R39 "" R0603 6096.74,3933.78 r180 top
R40 "" R0603 6108.67,4822.79 r180 top
R41 "" R0603 6113.31,5684.02 r180 top
R44 "" R0603 6393.68,5089.57 r270 top
R45 "" R0603 3902.25,5150.11 r0 top
R46 "" R0603 3912.73,4264.38 r0 top
R47 "" R0603 3899.14,3360.1 r0 top
R48 "" R0603 6100.76,4283.15 r180 top
R49 "" R0603 6104.77,5178.66 r180 top
R50 "" R0603 6117.88,6040.65 r180 top
R51 "" R0603 6458.12,5090.37 r270 top
R52 "" R0603 4439.43,6036.66 r180 top
R53 "" R0603 4475.22,5947.11 r90 top
R54 "" R0603 4408.25,5947.11 r90 top
R55 "" R0612 3508.02,5342.05 r180 top
R56 "" R0612 3502.32,4459.62 r180 top
R57 "" R0612 6408.72,4082.21 r0 top
R58 "" R0612 6425.01,4959.58 r0 top
R_AGND1 "" R0603 6825.22,5644.82 r90 top
R_AGND2 "" R0603 3319.87,5829.95 r90 top
R_DGND1 "" R0603 6660.22,6306.84 r270 top
R_DGND2 "" R0603 3317.53,5985.61 r270 top
SCREW1 "" M2螺丝 3168.65,7044.13 r0 top locked
SCREW2 "" M2螺丝 6914.87,7047.95 r0 top locked
SCREW3 "" M2螺丝 3166.24,3294.88 r0 top locked
SCREW4 "" M2螺丝 6916.87,3293.58 r0 top locked
SW1 "" Key_SMD_3x4x2 5813.5,3324.64 r90 top
SW2 "" Key_SMD_3x4x2 5998.12,3323.56 r90 top
SW3 "" Key_SMD_3x4x2 6181.43,3326.53 r90 top
SW4 "" SW-TH_RS601B-101N011R1B 3796.72,6949.21 r0 top
TP1 "" Test-Point-0.5mm 6334.56,4245.74 r90 top
TP2 "" Test-Point-0.5mm 6481.65,4248.81 r270 top
TP3 "" Test-Point-0.5mm 3584.78,5505.23 r0 top
TP4 "" Test-Point-0.5mm 3430.75,5503.92 r0 top
TP5 "" Test-Point-0.5mm 3579.32,4635.15 r180 top
TP6 "" Test-Point-0.5mm 3416.13,4624.4 r270 top
TP7 "" Test-Point-0.5mm 6351.63,5128.83 r0 top
TP8 "" Test-Point-0.5mm 6499.81,5129.25 r0 top
U2 "" SOD-323_L1.7-W1.3-LS2.5-RD 4587.87,3515.95 r270 top
U3 "" LGA-14_L3.0-W2.5-P0.50-TL 5189.76,4057 r270 top
U4 "" LQFP-48_L7.0-W7.0-P0.50-LS9.0-BL 4986.95,4930.2 r0 top
U5 "" CONN-TH_XT30PW-M 3320.85,6336.81 r270 top
U6 "" HDR-TH_4P-P2.54-H-M-W10.3 4638.02,3395.28 r180 top
U11 "" TSOT-23-8_L2.9-W1.6-P0.65-LS2.8-BR 4775.87,6461.95 r270 top
U12 "" SOT-23-5_L3.0-W1.7-P0.95-LS2.8-BL 5294.13,5943.19 r180 top
U13 "" SOP-16_L10.0-W3.9-P1.27-LS6.0-BL 5159.05,3642.53 r0 top
U14 "" TSSOP-8_L4.4-W3.0-P0.65-LS6.4-BL 3509.86,5744.25 r180 top
U15 "" SMA_L4.3-W2.6-LS5.1-R-RD 4034.59,5357.93 r270 top
U16 "" SMA_L4.3-W2.6-LS5.1-R-RD 4039.25,4459.53 r270 top
U17 "" SMA_L4.3-W2.6-LS5.1-R-RD 4027.57,3563.36 r270 top
U18 "" SOIC-8_L5.0-W4.0-P1.27-LS6.0-BL 4200.97,5349.09 r0 top
U19 "" SOIC-8_L5.0-W4.0-P1.27-LS6.0-BL 4207.68,4445.07 r0 top
U20 "" SOIC-8_L5.0-W4.0-P1.27-LS6.0-BL 4200.02,3548.36 r0 top
U21 "" TSSOP-8_L4.4-W3.0-P0.65-LS6.4-BL 3504.92,4860.83 r180 top
U22 "" SMA_L4.3-W2.6-LS5.1-R-RD 5975.56,4076.22 r90 top
U23 "" SMA_L4.3-W2.6-LS5.1-R-RD 5978.28,4965.82 r90 top
U24 "" SMA_L4.3-W2.6-LS5.1-R-RD 5985.2,5858.56 r90 top
U25 "" SOIC-8_L5.0-W4.0-P1.27-LS6.0-BL 5807.61,4100.43 r180 top
U26 "" SOIC-8_L5.0-W4.0-P1.27-LS6.0-BL 5801.59,4963.82 r180 top
U27 "" SOIC-8_L5.0-W4.0-P1.27-LS6.0-BL 5818.55,5860.57 r180 top
U28 "" TSSOP-8_L4.4-W3.0-P0.65-LS6.4-BL 6408.5,4489.52 r0 top
U35 "" TSSOP-8_L4.4-W3.0-P0.65-LS6.4-BL 6422.27,5367 r0 top
U36 "" CONN-TH_MR30PW-M30-G-Y 6745.47,5997.5 r90 top
U37 "" CONN-TH_MR30PW-M30-G-Y 3329.97,3711.73 r270 top
USB1 "" USB-C-SMD_KH-TYPE-C-16P 5157.9,3355.51 r0 top
X1 "" CRYSTAL-SMD_L11.5-W4.8-LS12.7 4961.94,4584.2 r0 top

## Footprints (in the part's own frame and the unit in brackets; to place one, negate y for a bottom-side part, rotate by r counter-clockwise, add the part's x,y. Pads: shape width x height; smd on the part's side, far side on the other; paste and mask are expansions set on the pad)
C0603#1 [mm]
  rect 0.8x0.9 smd: 1(-0.7,0) 2(0.7,0)
  silkscreen extent -1.39,-0.71 1.39,0.71
C0603#2 [mm]
  rect 0.5x0.54 smd: 1(-0.42,0) 2(0.42,0)
  silkscreen extent -0.87,-0.5 0.87,0.5
C0805#1 [mm]
  rect 1.41x1.35 smd: 1(-1,0) 2(1,0)
  silkscreen extent -1.96,-0.9 1.96,0.9
C0805#2 [mm]
  rect 0.8x0.9 smd: 1(-0.7,0) 2(0.7,0)
  silkscreen extent -1.39,-0.71 1.39,0.71
C1206 [mm]
  rect 1.485x1.728 smd: 1(-1.593,0) 2(1.593,0)
  silkscreen extent -2.56,-1.09 2.56,1.09
CAP-SMD_BD6.3-L6.6-W6.6-FD [mm]
  rect 3.5x1.2 smd: 1(-2.67,0) 2(2.67,0)
  silkscreen extent -3.38,-3.38 3.38,3.38
CONN-SMD_GH1.25-6P [mm]
  rect 0.4x1.5 smd: 1(-3.125,1.825) 2(-1.875,1.825) 3(-0.625,1.825) 4(0.625,1.825) 5(1.875,1.825) 6(3.125,1.825)
  rect 0.5x2.5 smd: 7(-4.96,-1.825) 8(4.96,-1.825)
  silkscreen extent -5.4,-2.77 5.4,2.51
CONN-TH_MR30PW-M30-G-Y [mm]
  round 2.8 hole 1.9 slot 1.995 at 0 deg: 1(-3.5,5) 2(0,5) 3(3.5,5)
  round 1.7 hole 1: 4(6.5,-5) 5(-6.5,-5)
  silkscreen extent -7.65,-8.05 7.65,3.65
CONN-TH_XT30PW-M [mm]
  round 2.5 hole 1.8: 1(-2.5,5) 2(2.5,5)
  round 1.8 hole 1.1: 3(5.5,-5) 4(-5.5,-5)
  silkscreen extent -6.65,-8.15 6.65,3.81
CRYSTAL-SMD_L11.5-W4.8-LS12.7 [mm]
  rect 5.5x2 smd: 1(-4.45,0) 2(4.45,0)
  silkscreen extent -5.7,-2.4 5.7,2.4
DFN5X6-8_L5.8-W5.0-P1.27-LS6.2-BL-EP [mm]
  rect 0.55x1.1 smd: 1(-1.905,-3.025) 2(-0.635,-3.025) 3(0.635,-3.025) 4(1.905,-3.025) 5(1.905,3.025) 6(0.635,3.025) 7(-0.635,3.025) 8(-1.905,3.025)
  rect 4.8x4 smd: 8(0,0.61)
  silkscreen extent -2.85,-3.53 2.6,2.92
HDR-TH_4P-P2.54-H-M-W10.3 [mm]
  rect 1.8x1.8 hole 1.1: 1(-3.81,0)
  round 1.8 hole 1.1: 2(-1.27,0) 3(1.27,0) 4(3.81,0)
  silkscreen extent -5.08,1.5 5.08,10.04
HDR-TH_12P-P2.54-V-M [mil]
  rect 60x60 hole 41.34: 1(-550,0)
  round 60 hole 41.34: 2(-450,0) 3(-350,0) 4(-250,0) 5(-150,0) 6(-50,0) 7(50,0) 8(150,0) 9(250,0) 10(350,0) 11(450,0) 12(550,0)
  silkscreen extent -600,-49 600,49
HDR-TH_16P-P2.54-V-M-R2-C8-S2.54 [mm]
  rect 1.8x1.8 hole 1.2: 1(-8.89,-1.27)
  round 1.8 hole 1.2: 2(-8.89,1.27) 3(-6.35,-1.27) 4(-6.35,1.27) 5(-3.81,-1.27) 6(-3.81,1.27) 7(-1.27,-1.27) 8(-1.27,1.27) 9(1.27,-1.27) 10(1.27,1.27) 11(3.81,-1.27) 12(3.81,1.27) 13(6.35,-1.27) 14(6.35,1.27) 15(8.89,-1.27) 16(8.89,1.27)
  silkscreen extent -10.16,-2.5 10.16,2.5
IND-SMD_L10.5-W10.2-HSB-1050 [mm]
  rect 3.5x4 smd: 1(-3.65,0) 2(3.65,0)
  silkscreen extent -5.25,-5.1 5.25,5.1
Key_SMD_3x4x2 [mm]
  rect 1.53x1.36 smd: 1(-2.035,0) 2(2.035,0)
  silkscreen extent -2.08,-1.58 2.08,1.58
L0603 [mm]
  rect 0.8x0.864 smd: 1(-0.7,0) 2(0.7,0)
  silkscreen extent -1.42,-0.65 1.42,0.65
LED_0603 [mil]
  rect 31.5x31.5 smd: 1(-33.5,-0.4) 2(29.5,-0.2)
  silkscreen extent -61,-30 53,30
LGA-14_L3.0-W2.5-P0.50-TL [mm]
  rect 0.675x0.28 smd: 1(-1.262,0.75) 2(-1.262,0.25) 3(-1.262,-0.25) 4(-1.262,-0.75) 8(1.262,-0.75) 9(1.262,-0.25) 10(1.262,0.25) 11(1.262,0.75)
  rect 0.28x0.675 smd: 5(-0.5,-1.012) 6(0,-1.012) 7(0.5,-1.012) 12(0.5,1.012) 13(0,1.012) 14(-0.5,1.012)
  silkscreen extent -1.98,-1.33 1.58,1.33
LQFP-48_L7.0-W7.0-P0.50-LS9.0-BL [mm]
  oval 0.27x1.5 smd: 1(-2.75,-4.25) 2(-2.25,-4.25) 3(-1.75,-4.25) 4(-1.25,-4.25) 5(-0.75,-4.25) 6(-0.25,-4.25) 7(0.25,-4.25) 8(0.75,-4.25) 9(1.25,-4.25) 10(1.75,-4.25) 11(2.25,-4.25) 12(2.75,-4.25) 25(2.75,4.25) 26(2.25,4.25) 27(1.75,4.25) 28(1.25,4.25) 29(0.75,4.25) 30(0.25,4.25) 31(-0.25,4.25) 32(-0.75,4.25) 33(-1.25,4.25) 34(-1.75,4.25) 35(-2.25,4.25) 36(-2.75,4.25)
  oval 1.5x0.27 smd: 13(4.25,-2.75) 14(4.25,-2.25) 15(4.25,-1.75) 16(4.25,-1.25) 17(4.25,-0.75) 18(4.25,-0.25) 19(4.25,0.25) 20(4.25,0.75) 21(4.25,1.25) 22(4.25,1.75) 23(4.25,2.25) 24(4.25,2.75) 37(-4.25,2.75) 38(-4.25,2.25) 39(-4.25,1.75) 40(-4.25,1.25) 41(-4.25,0.75) 42(-4.25,0.25) 43(-4.25,-0.25) 44(-4.25,-0.75) 45(-4.25,-1.25) 46(-4.25,-1.75) 47(-4.25,-2.25) 48(-4.25,-2.75)
  silkscreen extent -3.59,-4.46 3.3,3.34
M2螺丝 [mm]
  round 2 hole 2: 1(0,0)
  silkscreen extent -1.9,-1.9 1.9,1.9
R0603 [mil]
  rect 31.75x34.02 smd: 1(-29.66,0) 2(29.66,0)
  silkscreen extent -55,-26 55,26
R0612 [mm]
  rect 1x3.2 smd: 1(-0.8,0) 2(0.8,0)
  silkscreen extent -1.47,-1.78 1.47,1.78
SMA_L4.3-W2.6-LS5.1-R-RD [mm]
  rect 2x2 smd: 1(2.2,0) 2(-2.2,0)
  silkscreen extent -2.98,-1.5 2.6,1.5
SOD-123_L2.7-W1.6-LS3.7-RD [mm]
  rect 0.91x1.22 smd: 1(-1.635,0) 2(1.635,0)
  silkscreen extent -1.6,-1 1.38,1
SOD-123_L2.7-W1.8-LS3.7-BI [mm]
  rect 1.4x1.2 smd: 1(-1.735,0) 2(1.735,0)
  silkscreen extent -1.38,-0.93 1.38,0.93
SOD-323_L1.7-W1.3-LS2.5-RD [mm]
  rect 0.8x0.8 smd: 1(-1.2,0) 2(1.2,0)
  silkscreen extent -1.1,-0.7 1,0.7
SOD-323_L1.8-W1.3-LS2.5-RD [mm]
  rect 1x0.7 smd: 1(-1.172,0) 2(1.172,0)
  silkscreen extent -1.08,-0.8 0.9,0.8
SOIC-8_L5.0-W4.0-P1.27-LS6.0-BL [mil]
  oval 22.38x76.78 smd: 1(-75,-106.5) 2(-25,-106.5) 3(25,-106.5) 4(75,-106.5) 5(75,106.5) 6(25,106.5) 7(-25,106.5) 8(-75,106.5)
  silkscreen extent -98,-59 98,59
SOP-16_L10.0-W3.9-P1.27-LS6.0-BL [mm]
  oval 0.56x1.745 smd: 1(-4.445,-2.872) 2(-3.175,-2.872) 3(-1.905,-2.872) 4(-0.635,-2.872) 5(0.635,-2.872) 6(1.905,-2.872) 7(3.175,-2.872) 8(4.445,-2.872) 9(4.445,2.872) 10(3.175,2.872) 11(1.905,2.872) 12(0.635,2.872) 13(-0.635,2.872) 14(-1.905,2.872) 15(-3.175,2.872) 16(-4.445,2.872)
  silkscreen extent -5.33,-3.02 5.08,1.77
SOT-23-5_L3.0-W1.7-P0.95-LS2.8-BL [mm]
  rect 0.49x1.157 smd: 1(-0.95,-1.154) 2(0,-1.154) 3(0.95,-1.154)
  rect 0.49x1.175 smd: 4(0.95,1.154) 5(-0.95,1.154)
  silkscreen extent -1.8,-1.29 1.53,0.85
SW-TH_RS601B-101N011R1B [mm]
  oval 3x7.4 hole 1.4 slot 5.4 at 90 deg: 1(-7.1,0) 2(0,0) 3(7.1,0)
  silkscreen extent -10.5,-7.5 10.5,7.5
Test-Point-0.5mm [mm]
  round 0.5 smd: 1(0,0)
TO-252-2_L6.6-W6.1-P4.57-LS9.9-BR-CW [mm]
  rect 3x1.6 smd: 1(3.424,-2.29) 3(3.424,2.29)
  rect 6.2x5.8 smd: 2(-3.424,0)
  silkscreen extent -4.58,-3.35 1.38,3.35
TSOT-23-8_L2.9-W1.6-P0.65-LS2.8-BR [mil]
  oval 48.11x14.33 smd: 1(47.68,-38.39) 2(47.68,-12.8) 3(47.68,12.79) 4(47.68,38.39) 5(-47.68,38.39) 6(-47.68,12.79) 7(-47.68,-12.8) 8(-47.68,-38.39)
  silkscreen extent -15,-69 54,60
TSSOP-8_L4.4-W3.0-P0.65-LS6.4-BL [mil]
  oval 13.9x57.24 smd: 1(-38.39,-115.24) 2(-12.79,-115.24) 3(12.8,-115.24) 4(38.39,-115.24) 5(38.39,115.24) 6(12.8,115.24) 7(-12.79,115.24) 8(-38.39,115.24)
  silkscreen extent -59,-76 59,77
USB-C-SMD_KH-TYPE-C-16P [mm]
  oval 1x2 hole 0.6 slot 1.7 at 90 deg: 1(-4.32,1.765) 2(4.32,1.765)
  oval 1x1.8 hole 0.6 slot 1.4 at 90 deg: 3(-4.32,-2.415) 4(4.32,-2.415)
  rect 0.3x1.3 smd: A1(-3.35,2.415) A4(-2.55,2.415) A5(-1.25,2.415) A6(-0.25,2.415) A7(0.25,2.415) A8(1.25,2.415) A9(2.55,2.415) A12(3.35,2.415) B1(3.05,2.415) B4(2.25,2.415) B5(1.75,2.415) B6(0.75,2.415) B7(-0.75,2.415) B8(-1.75,2.415) B9(-2.25,2.415) B12(-3.05,2.415)
  Board Outline Layer circle w0.003: c-2.89,1.235 r0.35
  Board Outline Layer circle w0.003: c2.89,1.235 r0.35
  Board Outline Layer region: -2.54,1.235 -2.575,1.083 -2.672,0.961 -2.812,0.894 -2.968,0.894 -3.108,0.961 -3.205,1.083 -3.24,1.235 -3.24,1.235 -3.205,1.387 -3.108,1.509 -2.968,1.576 -2.812,1.576 -2.672,1.509 -2.575,1.387 -2.54,1.235
  Board Outline Layer region: -2.54,1.235 -2.575,1.083 -2.672,0.961 -2.812,0.894 -2.968,0.894 -3.108,0.961 -3.205,1.083 -3.24,1.235 -3.24,1.235 -3.205,1.387 -3.108,1.509 -2.968,1.576 -2.812,1.576 -2.672,1.509 -2.575,1.387 -2.54,1.235
  Board Outline Layer region: 3.24,1.235 3.205,1.083 3.108,0.961 2.968,0.894 2.812,0.894 2.672,0.961 2.575,1.083 2.54,1.235 2.54,1.235 2.575,1.387 2.672,1.509 2.812,1.576 2.968,1.576 3.108,1.509 3.205,1.387 3.24,1.235
  Board Outline Layer region: 3.24,1.235 3.205,1.083 3.108,0.961 2.968,0.894 2.812,0.894 2.672,0.961 2.575,1.083 2.54,1.235 2.54,1.235 2.575,1.387 2.672,1.509 2.812,1.576 2.968,1.576 3.108,1.509 3.205,1.387 3.24,1.235
  silkscreen extent -4.57,-5.08 4.57,0.57
?#1 [mm]
  rect 0.8x0.9 smd: 1(-0.7,0) 2(0.7,0)
  silkscreen extent -1.39,-0.71 1.39,0.71
?#2 [mm]
  rect 0.806x0.864 smd: 1(-0.753,0) 2(0.753,0)
  silkscreen extent -1.39,-0.66 1.39,0.66

## Via types
v1: diameter 24.02, hole 12.01, Top Layer to Bottom Layer, 893 vias

## Nets (pads, with @x,y where several pads share a name; then routed paths per layer and width w, separated by ;. In a path a pad name is that pad's centre, name@x,y a point inside that pad or via, vN(x,y) a via of type N, cw(c..) or ccw(c..) an arc to the next point about the centre after c; other vN are vias at no path point)
$1N2: LED1.2 R3.1 | length 59
  Top Layer w10: LED1.2@5522.04,3310.59 5522.85,3311.4 R3.1@5522.85,3369.29
$1N122: R10.1 U11.6 | length 67.5
  Top Layer w10: U11.6@4788.66,6509.63 4788.66,6536.74 4806.45,6554.53 R10.1@4806.45,6569.76
$1N125: C26.2 R13.1 R15.1 R16.2 | length 209.2
  Top Layer w15: C26.2@5083.76,6752.99 5081.57,6750.8 R15.1@5016.68,6750.8 5016.68,6680.88 R13.1@5017.86,6679.7 5021.87,6675.68 R16.2@5085.77,6675.68
$1N126: R13.2 U11.8 | length 425.9
  Top Layer w10: U11.8@4737.48,6509.63 4737.48,6466.64 v1(4738.17,6465.95) ; R13.2@5017.86,6620.38 5019.87,6618.36 v1(5019.87,6577.95)
  Bottom Layer w10: v1(4738.17,6465.95) 4759.87,6465.95 4827.87,6533.95 4993.87,6533.95 5019.87,6559.95 v1(5019.87,6577.95)
$1N127: R12.2 U11.5 | length 60.4
  Top Layer w10: U11.5@4814.26,6509.63 4834.19,6509.63 4841.87,6501.95 4869.83,6501.95 R12.2@4870.97,6503.09
$1N128: C23.2 R12.1 | length 69.1
  Top Layer w25: C23.2@4928.58,6434.71 4928.58,6501.39 R12.1@4930.29,6503.09
$1N130: C23.1 L1.2 U11.3 | length 1437.5
  Top Layer w15: U11.3@4788.66,6414.27 4788.66,6369.16 4791.87,6365.95 4849.87,6365.95 4873.46,6389.54 4873.46,6401.01
  Top Layer w20: L1.2@4574.63,6866.89 4574.63,6749.2 4603.87,6719.95 v1(4945.87,6719.95) ; C23.1@4873.46,6434.71 4875.92,6432.25 4875.92,6403.47 4873.46,6401.01 5088.93,6401.01 5154.02,6466.1 v1@5154.02,6697.81
  Bottom Layer w20: v1(4945.87,6719.95) 5137.87,6719.95 v1(5149.87,6707.95)
$1N133: C18.2 U11.7 | length 212.5
  Top Layer w10: U11.7@4763.07,6509.63 4763.87,6510.43 4763.87,6538.09 4779.6,6553.81 4779.6,6591.67 4787.87,6599.95 4863.87,6599.95 4874.59,6589.24 C18.2@4874.59,6568.47
$1N265: LED2.2 R1.1 | length 58.8
  Top Layer w10: R1.1@5656.84,3369.29 5657.04,3369.09 LED2.2@5657.04,3310.59
$1N335: C11.1 D16.1 R52.1 R53.2 R54.2 | length 296.1
  Top Layer w10: R54.2@4408.25,5976.77 R53.2@4475.22,5976.77 ; R52.1@4469.09,6036.66 4475.22,6030.52 R53.2@4475.22,5976.77 ; D16.1@4626.29,6003.61 4622.88,6007.02 4577.57,6007.02 C11.1@4545.22,5974.67 4543.12,5976.77 R53.2@4475.22,5976.77
$1N337: D1.2 Q1.1 R14.2 | length 245
  Top Layer w25: R14.2@4374.81,6314.72 4374.81,6398.59 Q1.1@4364.79,6408.6 4416.52,6408.6 4451.03,6443.11 D1.2@4497.46,6443.11
$1N358: LED3.2 R9.1 | length 66.8
  Top Layer w20: R9.1@5460.32,5895 5462.17,5896.85 LED3.2@5462.17,5961.06
$1N365: Q1.2 SW4.2
$2N29: D5.1 R19.2 U19.7 | length 275.8
  Top Layer w20: R19.2@4016.45,4689.96 4043.29,4689.96 4061.8,4708.47 D5.1@4088.74,4708.47 4089.87,4707.34 4089.87,4676.39 4118.5,4647.75 4118.5,4635.62 4182.68,4571.44 U19.7@4182.68,4551.57
$2N30: D4.1 R18.2 U18.7 | length 468.1
  Top Layer w20: R18.2@4081.59,5524.96 4059.08,5524.96 4050.84,5516.73 D4.1@4009.7,5516.73 4000.65,5516.73 3975.42,5491.5 3975.42,5393.11 3983.45,5385.08 4133.74,5385.08 4175.97,5427.31 U18.7@4175.97,5455.59
$2N31: D6.1 R20.2 U20.7 | length 297.8
  Top Layer w20: R20.2@4003.2,3794.74 4017.36,3808.9 4073.93,3808.9 D6.1@4076.28,3811.24 4078.95,3813.92 4104.92,3813.92 4124,3794.84 4124,3724.57 4175.02,3673.55 U20.7@4175.02,3654.86
$2N44: C33.2 C34.2 U15.2 U18.8 | length 273.4
  Top Layer w20: U15.2@4034.59,5444.54 4114.92,5444.54 U18.8@4125.97,5455.59 4125.97,5517.56 4139.29,5530.88 C33.2@4167.93,5530.88 C34.2@4167.93,5598.87
$2N45: C37.2 C38.2 U17.2 U20.8 | length 432.3
  Top Layer w13: 4174.2,3593.56 4177.72,3593.56 4200.3,3616.14 4200.3,3700.47
  Top Layer w20: U17.2@4027.57,3649.97 4120.13,3649.97 U20.8@4125.02,3654.86 4125.02,3614.13 4145.59,3593.56 4174.2,3593.56 ; C38.2@4176.51,3801.35 C37.2@4176.51,3731.35 4174.5,3729.34 4174.5,3725.56 4196.52,3703.54 4203.37,3703.54
$2N46: C35.2 C36.2 U16.2 U19.8 | length 443.3
  Top Layer w10: C35.2@4176.6,4634.53 4176.6,4626.75 4207.37,4595.98
  Top Layer w12.99: 4207.37,4501.66 4207.37,4595.98
  Top Layer w13: 4200.81,4494.59 4207.37,4501.15
  Top Layer w20: U16.2@4039.25,4546.14 4127.25,4546.14 U19.8@4132.68,4551.57 4132.68,4502.98 4141.07,4494.59 4200.3,4494.59 ; C35.2@4176.6,4634.53 C36.2@4176.6,4707.62
$2N56: D8.1 R22.2 U19.5 | length 451.1
  Top Layer w20: D8.1@4011.66,4305.17 4039.35,4305.17 4047.53,4296.98 R22.2@4077.44,4296.98 4097.9,4317.44 4097.9,4383.15 4119.98,4405.24 4190.83,4405.24 4218.82,4433.23 4220.26,4433.23 4282.68,4495.65 U19.5@4282.68,4551.57
$2N57: D7.1 R21.2 U18.5 | length 575.7
  Top Layer w20: R21.2@4072.33,5195.8 4070.86,5194.33 4047.7,5194.33 4039.77,5202.26 D7.1@4008.08,5202.26 3992.88,5202.26 3974.71,5220.43 3974.71,5317.52 3993.49,5336.3 4175.61,5336.3 4275.97,5436.66 U18.5@4275.97,5455.59
$2N58: D9.1 R23.2 U20.5 | length 499.6
  Top Layer w20: D9.1@3999.98,3391.6 4027.28,3391.6 4049.81,3369.07 R23.2@4074.27,3369.07 4072.8,3370.54 4072.8,3406.32 4087.86,3421.38 4087.86,3479.61 4146.09,3537.84 4224.39,3537.84 4275.02,3588.46 U20.5@4275.02,3654.86
$2N72: D11.1 R27.2 U26.7 | length 244.8
  Top Layer w20: U26.7@5826.59,4857.32 5826.59,4841.69 5850.84,4817.43 5850.84,4802.32 5864.83,4788.33 5904.57,4788.33 5924.35,4808.1 D11.1@5939.2,4808.1 ; D11.1@5936.11,4811.2 D11.1@5939.2,4808.1 ; R27.2@6008.4,4798.71 6002.3,4804.8 5942.51,4804.8 D11.1@5939.2,4808.1
$2N73: D12.1 R28.2 U27.7 | length 289.4
  Top Layer w20: U27.7@5843.55,5754.07 5843.55,5736.44 5886.91,5693.07 5886.91,5613.98 5901.06,5599.83 5925.23,5599.83 D12.1@5926.97,5601.58 5952.82,5601.58 5970.24,5619 6000.35,5619 R28.2@6003.27,5616.07
$2N74: D10.1 R26.2 U25.7 | length 276.3
  Top Layer w20: U25.7@5832.61,3993.93 5832.61,3966.5 5862.82,3936.29 5862.82,3860.97 5883.92,3839.86 R26.2@5903.98,3839.86 5934.25,3839.86 5947.15,3826.97 5974.2,3826.97 D10.1@5978,3830.77
$2N84: C59.2 C60.2 U24.2 U27.8 | length 427.8
  Top Layer w13: 5828.68,5812.76 5819.49,5803.56 5819.49,5708.35 5839.64,5688.2 C59.2@5839.64,5672.75
  Top Layer w20: 5828.68,5812.76 5864.83,5812.76 5893.55,5784.03 U27.8@5893.55,5754.07 5912.56,5754.07 5930.44,5771.95 U24.2@5985.2,5771.95 ; C59.2@5839.64,5672.75 5842.19,5670.2 C60.2@5842.19,5603.94
$2N85: C55.2 C58.2 U23.2 U26.8 | length 436.6
  Top Layer w13: C55.2@5819.11,4781.1 5802.58,4797.62 5802.58,4901.18 5822.66,4921.26
  Top Layer w20: C55.2@5819.11,4781.1 5820.1,4780.1 C58.2@5820.1,4716.46 ; 5824.67,4921.26 5858.8,4921.26 5876.59,4903.48 U26.8@5876.59,4857.32 5905.29,4857.32 5927.18,4879.21 U23.2@5978.28,4879.21
$2N86: C53.2 C54.2 U22.2 U25.8 | length 437.3
  Top Layer w13: 5814.63,4055.87 5806.28,4047.52 5806.28,3936.75 C53.2@5826.76,3916.27
  Top Layer w20: 5814.63,4055.87 5858.8,4055.87 5882.61,4032.06 U25.8@5882.61,3993.93 5886.93,3989.6 U22.2@5975.56,3989.6 ; C54.2@5826.76,3841.27 C53.2@5826.76,3916.27
$2N90: D15.1 R31.2 U27.5 | length 579.7
  Top Layer w20: U27.5@5743.55,5754.07 5743.55,5840.06 5788.54,5885.05 5900.98,5885.05 5925.06,5909.13 5925.06,6075.79 5942.13,6092.85 5963.76,6092.85 R31.2@5967.23,6089.38 5992.87,6089.38 6007.36,6103.88 D15.1@6027.46,6103.88
$2N91: D14.1 R30.2 U26.5 | length 506.6
  Top Layer w20: U26.5@5726.59,4857.32 5726.59,4919.55 5810.61,5003.58 5888.92,5003.58 5915.02,5029.69 5915.02,5091.1 5936.11,5112.19 R30.2@5936.11,5149 5950.32,5149 5969.24,5130.08 6009.99,5130.08 D14.1@6010.4,5130.49
$2N92: D13.1 R29.2 U25.5 | length 478.7
  Top Layer w20: U25.5@5732.61,3993.93 5732.61,4078.25 5770.46,4116.1 5876.87,4116.1 5914.02,4153.25 5914.02,4238.99 D13.1@5926.07,4251.04 5945.55,4251.04 5962.05,4267.54 R29.2@5998.35,4267.54
ADC1_IN1: H3.1 U4.8 U14.8 | length 2214.8
  Top Layer w10: v1(3529.67,5690.28) 3548.25,5671.7 U14.8@3548.25,5629.01 ; H3.1@4461.84,5642.33 4460.28,5640.76 4460.28,5590.93 4467.35,5583.86 4489.43,5583.86 4754.47,5318.82 4754.47,5091.93 4791.63,5054.77 4851.87,5054.77 5016.48,4890.16 U4.8@5016.48,4762.88
  Bottom Layer w20: v1(3529.67,5690.28) 3547.74,5708.35 3650.14,5708.35 3740.5,5617.99 3949.31,5617.99 3971.4,5640.08 4459.59,5640.08 H3.1@4461.84,5642.33
ADC2_IN2: H1.10 U4.9 U21.8 | length 3224.7
  Top Layer w10: U4.9@5036.16,4762.88 5036.16,4699.81 5089.79,4646.18 5290.57,4646.18 5362.05,4574.71 H1.10@5362.05,4305.18
  Top Layer w20: v1(3523.65,4806.81) 3543.31,4787.15 U21.8@3543.31,4745.59
  Inner1 w20: v1(3523.65,4806.81) 3523.65,4824.87 3543.65,4844.87 3642.2,4844.87 3730.46,4756.61 4336.83,4756.61 4409.12,4684.33 4409.12,4266.69 4465.34,4210.47 5324.71,4210.47 5362.05,4247.81 H1.10@5362.05,4305.18
ADC2_IN17_BUS: H3.2 R54.1 U4.12 | length 1473.4
  Top Layer w10: R54.1@4408.25,5917.45 4408.25,5853.65 4561.84,5700.07 H3.2@4561.84,5642.33 4561.84,5531.27 4768.49,5324.62 4768.49,5102.01 4798.65,5071.85 4857.09,5071.85 5034.57,4894.37 5034.57,4851.11 5095.22,4790.46 U4.12@5095.22,4762.88
ADC3_IN12: H4.7 U4.16 U28.8 | length 1578.8
  Top Layer w10: U4.16@5154.27,4880.99 5332.63,4880.99 5469.08,5017.44 H4.7@5561.64,5017.44
  Top Layer w20: v1(6340.69,4620.08) 6360.77,4620.08 6370.11,4610.74 U28.8@6370.11,4604.76
  Inner1 w20: H4.7@5561.64,5017.44 5664.04,4915.04 5664.04,4712.44 5702.19,4674.29 6017.42,4674.29 6033.49,4690.35 6270.42,4690.35 v1(6340.69,4620.08)
ADC4_IN3: H3.11 U4.26 U35.8 | length 1730.7
  Top Layer w10: U4.26@5075.53,5097.52 5075.53,5178.07 5465.26,5567.8 5465.26,5638.91 H3.11@5461.84,5642.33
  Top Layer w20: v1(6354.75,5501.54) 6366.8,5489.49 6376.83,5489.49
  Bottom Layer w20: H3.11@5461.84,5642.33 5515.81,5696.3 5635.93,5696.3 5760.28,5571.95 6284.33,5571.95 v1(6354.75,5501.54)
AGND: C11.2 C40.2 C47.2 C50.2 C52.2 C56.2 C57.2 C76.2 C77.2 C80.2 C82.2 D16.2 H4.10 R53.1 R_AGND1.1 R_AGND2.1 U4.19 U14.4 U14.7 U21.4 U21.7 U28.4 U28.7 U35.4 U35.7 | length 8773.1
  Top Layer w15: R_AGND2.1@3319.87,5800.29 3319.87,5744.48 v1(3340.4,5723.95) C47.2@3340.4,5691.41 3406.63,5691.41 C40.2@3408.23,5689.8 3412.87,5694.44 3412.87,5732.95 3471.47,5791.55 U14.4@3471.47,5859.49 ; C52.2@3335.08,4767.27 3402.13,4767.27 C50.2@3402.66,4766.74 v1(3402.66,4723.95) ; v1(3465.87,5017.95) 3466.53,5017.3 U21.4@3466.53,4976.07 ; v1(3493.87,4797.95) 3517.71,4774.12 U21.7@3517.71,4745.59 ; v1(3495.87,5683.95) 3522.65,5657.18 U14.7@3522.65,5629.01 ; R53.1@4475.22,5917.45 4543.12,5917.45 C11.2@4545.22,5919.55 ; v1(4597.87,5919.55) C11.2@4545.22,5919.55 ; C56.2@4963.36,5925.05 4963.36,5857.18 C57.2@4963.2,5857.03 4962.13,5855.95 4901.87,5855.95 4882.96,5874.86 D16.2@4626.29,5874.86 4550.96,5874.86 4545.22,5880.6 C11.2@4545.22,5919.55 ; U4.19@5154.27,4940.04 5217.96,4940.04 v1(5243.87,4965.95)
  Top Layer w20: v1(6359.87,5616.26) C82.2@6401.21,5616.26 C80.2@6401.21,5548.65 ; v1(6394.1,4783.95) C77.2@6394.1,4737.73 6394.1,4670.08 C76.2@6393.57,4669.56 6395.71,4667.41 U28.7@6395.71,4604.76 6395.71,4554.12 v1(6395.87,4553.95) ; C80.2@6401.24,5548.62 6409.48,5540.38 U35.7@6409.48,5482.24 ; v1(6445.87,4437.95) 6446.89,4436.94 U28.4@6446.89,4374.28 ; U35.4@6460.66,5251.76 v1(6460.66,5305.95) ; v1(6825.22,5565.95) R_AGND1.1@6825.22,5615.16
  Inner3 w30: v1(3367.87,4659.95) 3367.87,3489.95 3627.87,3229.95 4393.09,3229.95 ; 4455.87,3261.95 4423.87,3229.95 4393.09,3229.95 ; v1(4493.87,5873.95) 4493.87,5825.95 4393.09,5725.17 4393.09,3229.95 ; v1(4891.15,5866.67) 5011.87,5745.95 5593.87,5745.95 5615.09,5724.74 5615.09,5347.95 5584.58,5317.44 H4.10@5561.64,5317.44
  Bottom Layer w15: v1(5243.87,4965.95) 5243.87,4999.68 H4.10@5561.64,5317.44
CC1: R11.1 USB1.A5 | length 480.8
  Top Layer w10: USB1.A5@5108.69,3450.59 5108.69,3578.82 5146.01,3616.14 5316.68,3616.14 5395.33,3537.49 R11.1@5395.33,3519.62
CC2: R8.2 USB1.B5 | length 499.2
  Top Layer w10: R8.2@4918.7,3470.47 4918.7,3379.63 4951.24,3347.09 5198.21,3347.09 5226.8,3375.67 USB1.B5@5226.8,3450.59
DC_IN+: C24.2 C25.2 D2.2 SW4.1 U5.1
DGND: C1.2 C2.2 C3.1 C4.1 C5.1 C6.1 C7.1 C8.1 C9.1 C10.1 C14.1 C15.1 C16.1 C19.2 C20.2 C28.2 CN1.6 CN1.7 CN1.8 CN2.6 CN2.7 CN2.8 CN3.6 CN3.7 CN3.8 LED3.1 P1.1 P1.3 P1.5 P1.7 P1.9 P1.11 P1.13 P1.15 R8.1 R11.2 R_AGND1.2 R_AGND2.2 R_DGND1.2 R_DGND2.2 SW1.1 SW2.1 SW3.1 U3.6 U3.7 U4.23 U4.35 U4.47 U6.4 U12.2 U13.1 USB1.1 USB1.2 USB1.3 USB1.4 USB1.A1 USB1.A12 USB1.B1 USB1.B12 | length 4882.6
  Top Layer w10: C15.1@4889.12,5198.26 4889.12,5153.23 C16.1@4887.98,5152.09 4887.87,5151.98 4887.87,5135.95 4898.37,5125.45 U4.35@4898.37,5097.52 ; U4.23@5154.27,5018.78 5192.7,5018.78 5203.87,5029.95 5203.87,5059.95 5196.8,5067.02 C9.1@5179.81,5067.02 ; C9.1@5178.61,5065.83 C9.1@5179.81,5067.02 ; C10.1@5178.6,5112.01 5178.61,5068.22 C9.1@5179.81,5067.02
  Top Layer w15: C2.2@4464.31,3539.95 C1.2@4464.31,3469.95 4464.31,3418.98 U6.4@4488.02,3395.28 ; v1(4643.96,4451.95) C3.1@4643.96,4508.56 ; v1(4729.87,4759.95) 4743.87,4759.95 4755.62,4748.2 C5.1@4783.4,4748.2 4784.4,4749.2 C4.1@4784.4,4794.2 4761.87,4816.73 4761.87,4823.95 4779.54,4841.62 U4.47@4819.63,4841.62 ; v1(4863.87,3529.95) 4864.04,3529.79 R8.1@4918.7,3529.79 4983.71,3529.79 U13.1@4984.05,3529.44 ; C15.1@4889.12,5198.26 4889.12,5235.2 v1(4889.87,5235.95) ; USB1.1@4987.82,3424.99 5014.77,3451.95 5036.45,3451.95 USB1.B12@5037.82,3450.59 ; C28.2@5039.43,3819.95 v1(5039.43,3871.95) ; v1(5063.87,4041.95) 5101.22,4041.95 C6.1@5101.83,4041.33 5145.88,4041.33 U3.7@5149.9,4037.31 U3.6@5149.9,4057 ; v1(5087.87,3967.63) C8.1@5127.27,3967.63 ; C10.1@5178.6,5112.01 v1(5178.6,5139.95) ; C19.2@5189.4,5931.54 5189.87,5931.07 v1(5189.87,5879.95) ; v1(5207.87,5837.95) 5265.39,5837.95 C20.2@5268.57,5834.77 ; v1(5225.87,7075.95) 5226.55,7075.28 CN3.8@5267.97,7075.28 ; P1.11@5259.87,6116.14 5259.87,6053.96 5294.13,6019.7 U12.2@5294.13,5988.61 ; C7.1@5281.99,4501.61 v1(5281.99,4553.95) ; USB1.A12@5289.79,3450.59 5302.39,3450.59 USB1.2@5327.98,3424.99 5384.92,3425 5395.33,3435.41 R11.2@5395.33,3460.3 ; v1(5340.22,6867.95) CN3.6@5340.22,6931.58 ; LED3.1@5399.17,5960.86 v1(5399.17,5993.95) ; CN3.7@5658.53,7075.28 v1(5701.87,7075.28) ; v1(5751.87,7077.95) 5787.34,7077.95 CN1.8@5790.02,7075.28 ; SW1.1@5813.5,3244.52 v1(5901.87,3244.52) 5997.03,3244.52 SW2.1@5998.12,3243.44 v1(6091.87,3243.44) 6178.45,3243.44 SW3.1@6181.43,3246.41 6270.33,3246.41 6289.87,3265.95 6289.87,3305.36 C14.1@6287.12,3308.12 ; v1(5815.87,6929.95) 5860.65,6929.95 CN1.6@5862.27,6931.58 ; CN1.7@6180.58,7075.28 v1(6217.87,7075.28) ; v1(6277.87,7075.28) CN2.8@6310.06,7075.28 ; v1(6345.87,6931.95) 6381.93,6931.95 CN2.6@6382.31,6931.58 ; CN2.7@6700.62,7075.28 6701.94,7073.95 v1(6741.87,7073.95)
  Top Layer w20: 3317.53,5912.42 3406.34,5912.42 3497.87,6003.95 3651.87,6003.95 3699.87,6051.95 v1(3701.87,6051.95) ; R_DGND1.2@6660.22,6277.18 6756.64,6277.18 6825.87,6207.95 6825.87,5675.14 R_AGND1.2@6825.22,5674.48
  Top Layer w30: R_DGND2.2@3317.53,5955.95 3317.53,5912.42 3317.53,5861.95 R_AGND2.2@3319.87,5859.61 ; v1(6275.87,6277.95) 6276.64,6277.18 R_DGND1.2@6660.22,6277.18
  Bottom Layer w15: P1.1@4759.87,6116.14 P1.3@4859.87,6116.14 P1.5@4959.87,6116.14 P1.7@5059.87,6116.14 P1.9@5159.87,6116.14 P1.11@5259.87,6116.14 P1.13@5359.87,6116.14 P1.15@5459.87,6116.14
GHA: D4.2 Q2.4 R18.1 R34.2 | length 253.7
  Top Layer w20: R34.2@3934.27,5499.72 3931.51,5502.48 Q2.4@3931.51,5579.92 3949.39,5579.92 3978.52,5609.05 D4.2@4009.7,5609.05 4030.54,5609.05 4055.31,5584.28 R18.1@4081.59,5584.28
GHA2: D10.2 Q5.4 R26.1 R39.2 | length 233.8
  Top Layer w20: R26.1@5903.98,3899.18 5924.99,3899.18 5948.9,3923.09 D10.2@5978,3923.09 6017.16,3923.09 6027.85,3933.78 R39.2@6067.08,3933.78 6070.05,3930.81 Q5.4@6070.05,3878.62
GHB: D5.2 Q3.4 R19.1 R35.2 | length 256.9
  Top Layer w20: Q3.4@3941.52,4709.3 3942.52,4708.3 R35.2@3942.52,4613.75 3965.07,4613.75 3981.96,4630.64 R19.1@4016.45,4630.64 4043.16,4630.64 4059.75,4614.06 4086.64,4614.06 D5.2@4088.74,4616.15
GHB2: D11.2 Q6.4 R27.1 R40.2 | length 239.6
  Top Layer w20: D11.2@5936.11,4718.88 5953.58,4718.88 5974.1,4739.39 R27.1@6008.4,4739.39 6009.24,4738.54 6059.76,4738.54 6062.76,4735.55 Q6.4@6077.92,4735.55 6077.92,4821.7 R40.2@6079.01,4822.79
GHC: D6.2 Q4.4 R20.1 R36.2 | length 219.1
  Top Layer w20: Q4.4@3928.12,3762.12 3928.12,3709.59 R36.2@3929.24,3708.48 3941.25,3708.48 3968.2,3735.42 R20.1@4003.2,3735.42 4034.84,3735.42 4051.34,3718.92 D6.2@4076.28,3718.92
GHC2: D12.2 Q7.4 R28.1 R41.2 | length 252.5
  Top Layer w20: D12.2@5926.97,5693.9 5928.37,5695.3 5950.16,5695.3 5965.22,5680.24 5998.43,5680.24 R28.1@6003.27,5675.39 6036.67,5675.39 6045.54,5684.25 6083.42,5684.25 R41.2@6083.65,5684.02 6083.24,5683.61 Q7.4@6083.24,5601
GLA: D7.2 Q8.4 R21.1 R45.2 | length 231.2
  Top Layer w20: Q8.4@3931.51,5206.13 3931.51,5150.51 R45.2@3931.91,5150.11 3965.42,5150.11 3973.41,5142.13 3973.41,5130.17 3993.63,5109.94 D7.2@4008.08,5109.94 4045.79,5109.94 R21.1@4072.33,5136.48
GLA2: D13.2 Q11.4 R29.1 R48.2 | length 246.2
  Top Layer w20: D13.2@5926.07,4343.36 5950.8,4343.36 5967.3,4326.86 R29.1@5998.35,4326.86 6061.67,4326.86 6071.1,4317.43 R48.2@6071.1,4283.15 6071.1,4227.53 Q11.4@6070.72,4227.15
GLB: D8.2 Q9.4 R22.1 R46.2 | length 233.1
  Top Layer w20: Q9.4@3941.01,4320.7 3941.01,4265.76 R46.2@3942.39,4264.38 3973.72,4264.38 3979.43,4258.66 3979.43,4222.29 3988.87,4212.85 D8.2@4011.66,4212.85 ; D8.2@4023.61,4212.48 4023.68,4212.56 4024.05,4212.56 4034.02,4222.52 4062.3,4222.52 R22.1@4077.44,4237.66
GLB2: D14.2 Q12.4 R30.1 R49.2 | length 245.8
  Top Layer w20: R30.1@5936.11,5208.32 5967.16,5208.32 5984.3,5225.45 6007.76,5225.45 D14.2@6010.4,5222.81 6061.23,5222.81 6076.66,5207.38 6076.66,5180.2 R49.2@6075.11,5178.66 6077.61,5176.16 Q12.4@6077.61,5118.42
GLC: D9.2 Q10.4 R23.1 R47.2 | length 256.7
  Top Layer w20: Q10.4@3927.19,3415.76 3928.8,3414.14 R47.2@3928.8,3360.1 3929.24,3359.66 3929.24,3316.97 3947.31,3298.9 3999.6,3298.9 D9.2@3999.98,3299.28 4032.02,3299.28 4042.49,3309.75 R23.1@4074.27,3309.75
GLC2: D15.2 Q13.4 R31.1 R50.2 | length 228.5
  Top Layer w20: R31.1@5967.23,6030.06 5990.86,6030.06 6009.37,6011.56 D15.2@6027.46,6011.56 6027.46,6041.65 6033.49,6047.68 6081.19,6047.68 R50.2@6088.22,6040.65 6088.22,6020.09 6081.68,6013.54 Q13.4@6081.71,5978.99
INT1: H2.5 U3.4 U4.44 | length 1829.2
  Top Layer w10: H2.5@4460.66,4832.17 4562.98,4832.17 4631.48,4900.67 U4.44@4819.63,4900.67 ; v1(5160.06,4158.27) 5160.06,4106.85 U3.4@5160.23,4106.68
  Bottom Layer w10: H2.5@4460.66,4832.17 4407.11,4778.62 4407.11,4258.66 4459.31,4206.46 5111.87,4206.46 v1(5160.06,4158.27)
NRST: C14.2 R7.1 SW3.2 U4.7 | length 2935.6
  Top Layer w10: v1(4977.35,4842.95) 4977.35,4818.86 4996.79,4799.41 U4.7@4996.79,4762.88 ; v1(6180.06,3331.02) 6181.43,3332.39 SW3.2@6181.43,3406.65 ; R7.1@6196.99,3471.15 6196.99,3422.21 SW3.2@6181.43,3406.65 ; C14.2@6287.12,3363.24 6286.24,3364.11 6239.34,3364.11 6232.27,3371.18 6232.27,3399.29 6224.91,3406.65 SW3.2@6181.43,3406.65
  Bottom Layer w10: v1(4977.35,4842.95) 5041.6,4842.95 5125.93,4758.62 5264.47,4758.62 5403.02,4620.08 5403.02,4188.39 5489.35,4102.05 5489.35,3345.08 5545.57,3288.86 6137.9,3288.86 v1(6180.06,3331.02)
OPA+: C32.2 R4.1 TP3.1 U14.2 | length 444.8
  Top Layer w15: U14.2@3522.65,5859.49 3522.65,5775.61 3568.68,5729.57 3568.68,5578.23 3553.68,5563.23 C32.2@3537.07,5563.23 3537.07,5506.85 R4.1@3540.98,5502.95 3582.5,5502.95 TP3.1@3584.78,5505.23
OPA+2: C74.2 R32.1 TP1.1 U28.2 | length 185.5
  Top Layer w18: TP1.1@6334.56,4245.74 6372.47,4245.74 R32.1@6377.19,4241.02 6377.19,4300.36 C74.2@6380.85,4304.01 6380.85,4320.9 6395.71,4335.77 U28.2@6395.71,4374.28
OPA-: C32.1 R17.1 TP4.1 U14.3 | length 448.5
  Top Layer w15: TP4.1@3430.75,5503.92 3432.22,5502.46 R17.1@3476.98,5502.46 3476.98,5558.25 3481.94,5563.21 3463.65,5563.21 3451.03,5575.83 3451.03,5732.11 3497.06,5778.14 U14.3@3497.06,5859.49
OPA-2: C74.1 R33.1 TP2.1 U28.3 | length 185.6
  Top Layer w18: U28.3@6421.3,4374.28 6421.3,4334.67 6435.97,4320 C74.1@6435.97,4304.01 6439.09,4300.89 R33.1@6439.09,4241.59 6446.32,4248.81 TP2.1@6481.65,4248.81
OPB+: C49.2 R24.1 TP5.1 U21.2 | length 442.2
  Top Layer w15: U21.2@3517.71,4976.07 3518.63,4975.15 3518.63,4868.05 3565.81,4820.87 3565.81,4716.34 C49.2@3530.77,4681.3 3537.59,4674.49 R24.1@3537.59,4619.36 3563.52,4619.36 TP5.1@3579.32,4635.15
OPB+2: C79.2 R44.1 TP7.1 U35.2 | length 185.1
  Top Layer w18: TP7.1@6351.63,5128.83 6361.22,5119.23 R44.1@6393.68,5119.23 6396.48,5122.03 C79.2@6396.48,5183.72 6409.48,5196.71 U35.2@6409.48,5251.76
OPB-: C49.1 R25.1 TP6.1 U21.3 | length 443.6
  Top Layer w15: TP6.1@3416.13,4624.4 3420.77,4619.76 R25.1@3465.32,4619.76 3475.65,4630.09 C49.1@3475.65,4681.3 3445.34,4711.61 3445.34,4820.87 3492.12,4867.65 U21.3@3492.12,4976.07
OPB-2: C79.1 R51.1 TP8.1 U35.3 | length 186.8
  Top Layer w18: U35.3@6435.07,5251.76 6435.07,5200.25 C79.1@6451.6,5183.72 6458.12,5177.2 R51.1@6458.12,5120.03 6490.58,5120.03 TP8.1@6499.81,5129.25
OSC_IN: C3.2 U4.5 X1.1 | length 474.4
  Top Layer w10: C3.2@4699.08,4508.56 4747.36,4508.56 4786.74,4547.93 X1.1@4786.74,4584.2 4931.43,4584.2 4957.42,4610.2 U4.5@4957.42,4762.88
OSC_OUT: C7.2 U4.6 X1.2 | length 474.1
  Top Layer w10: U4.6@4977.11,4762.88 4977.11,4608.27 5001.17,4584.2 X1.2@5137.14,4584.2 5137.14,4540.6 5174.12,4503.62 5224.86,4503.62 C7.2@5226.87,4501.61
PB6: H2.6 LED1.1 R6.1 SW2.2 U4.43 | length 3859.8
  Top Layer w10: H2.6@4460.66,4932.17 4518.68,4932.17 4528.68,4922.17 4817.83,4922.17 U4.43@4819.63,4920.36 ; v1(5453.21,3250.71) 5456.33,3247.59 LED1.1@5522.24,3247.59 5594.87,3247.59 5621.87,3220.59 5720.26,3220.59 5727.33,3227.66 5727.33,3253.76 5770.46,3296.89 5991.32,3296.89 5998.39,3303.96 5998.39,3403.4 SW2.2@5998.12,3403.68 6030.19,3435.76 R6.1@6030.19,3466.68
  Bottom Layer w10: H2.6@4460.66,4932.17 4376.99,4848.5 4376.99,3387.24 4450.28,3313.95 5389.97,3313.95 v1(5453.21,3250.71)
PB11: H4.3 LED2.1 R5.1 SW1.2 U4.25 | length 2711.2
  Top Layer w10: U4.25@5095.22,5097.52 5095.22,5069.95 5065.69,5040.42 5065.69,4987.52 5111.52,4941.69 5111.52,4817.42 5126.15,4802.8 5340.77,4802.8 5526.13,4617.44 H4.3@5561.64,4617.44 ; LED2.1@5657.24,3247.59 5697.06,3247.59 5714.24,3264.76 5714.24,3365.16 5741.39,3392.31 5801.04,3392.31 SW1.2@5813.5,3404.76 5824.12,3404.76 5850.77,3431.42 5850.77,3463.1 R5.1@5846.36,3467.51 5846.76,3467.91 5846.76,3497.68 5834.71,3509.72 5712.23,3509.72 v1(5690.14,3487.64)
  Bottom Layer w10: H4.3@5561.64,4617.44 5513.45,4569.25 5513.45,3533.82 5559.63,3487.64 v1(5690.14,3487.64)